# Altium PCB 400390.PcbDoc (part 1 of 5)
Units mm, origin at the board's own origin, x right, y up, seen from the top; angles counter-clockwise.
Board outline 50.8 x 50.4 mm, 4 copper layers (Top Layer, Mid Layer 1, Mid Layer 2, Bottom Layer), stack 1.507 mm thick; 262 components, 210 nets, 1216 pads, 1075 vias.
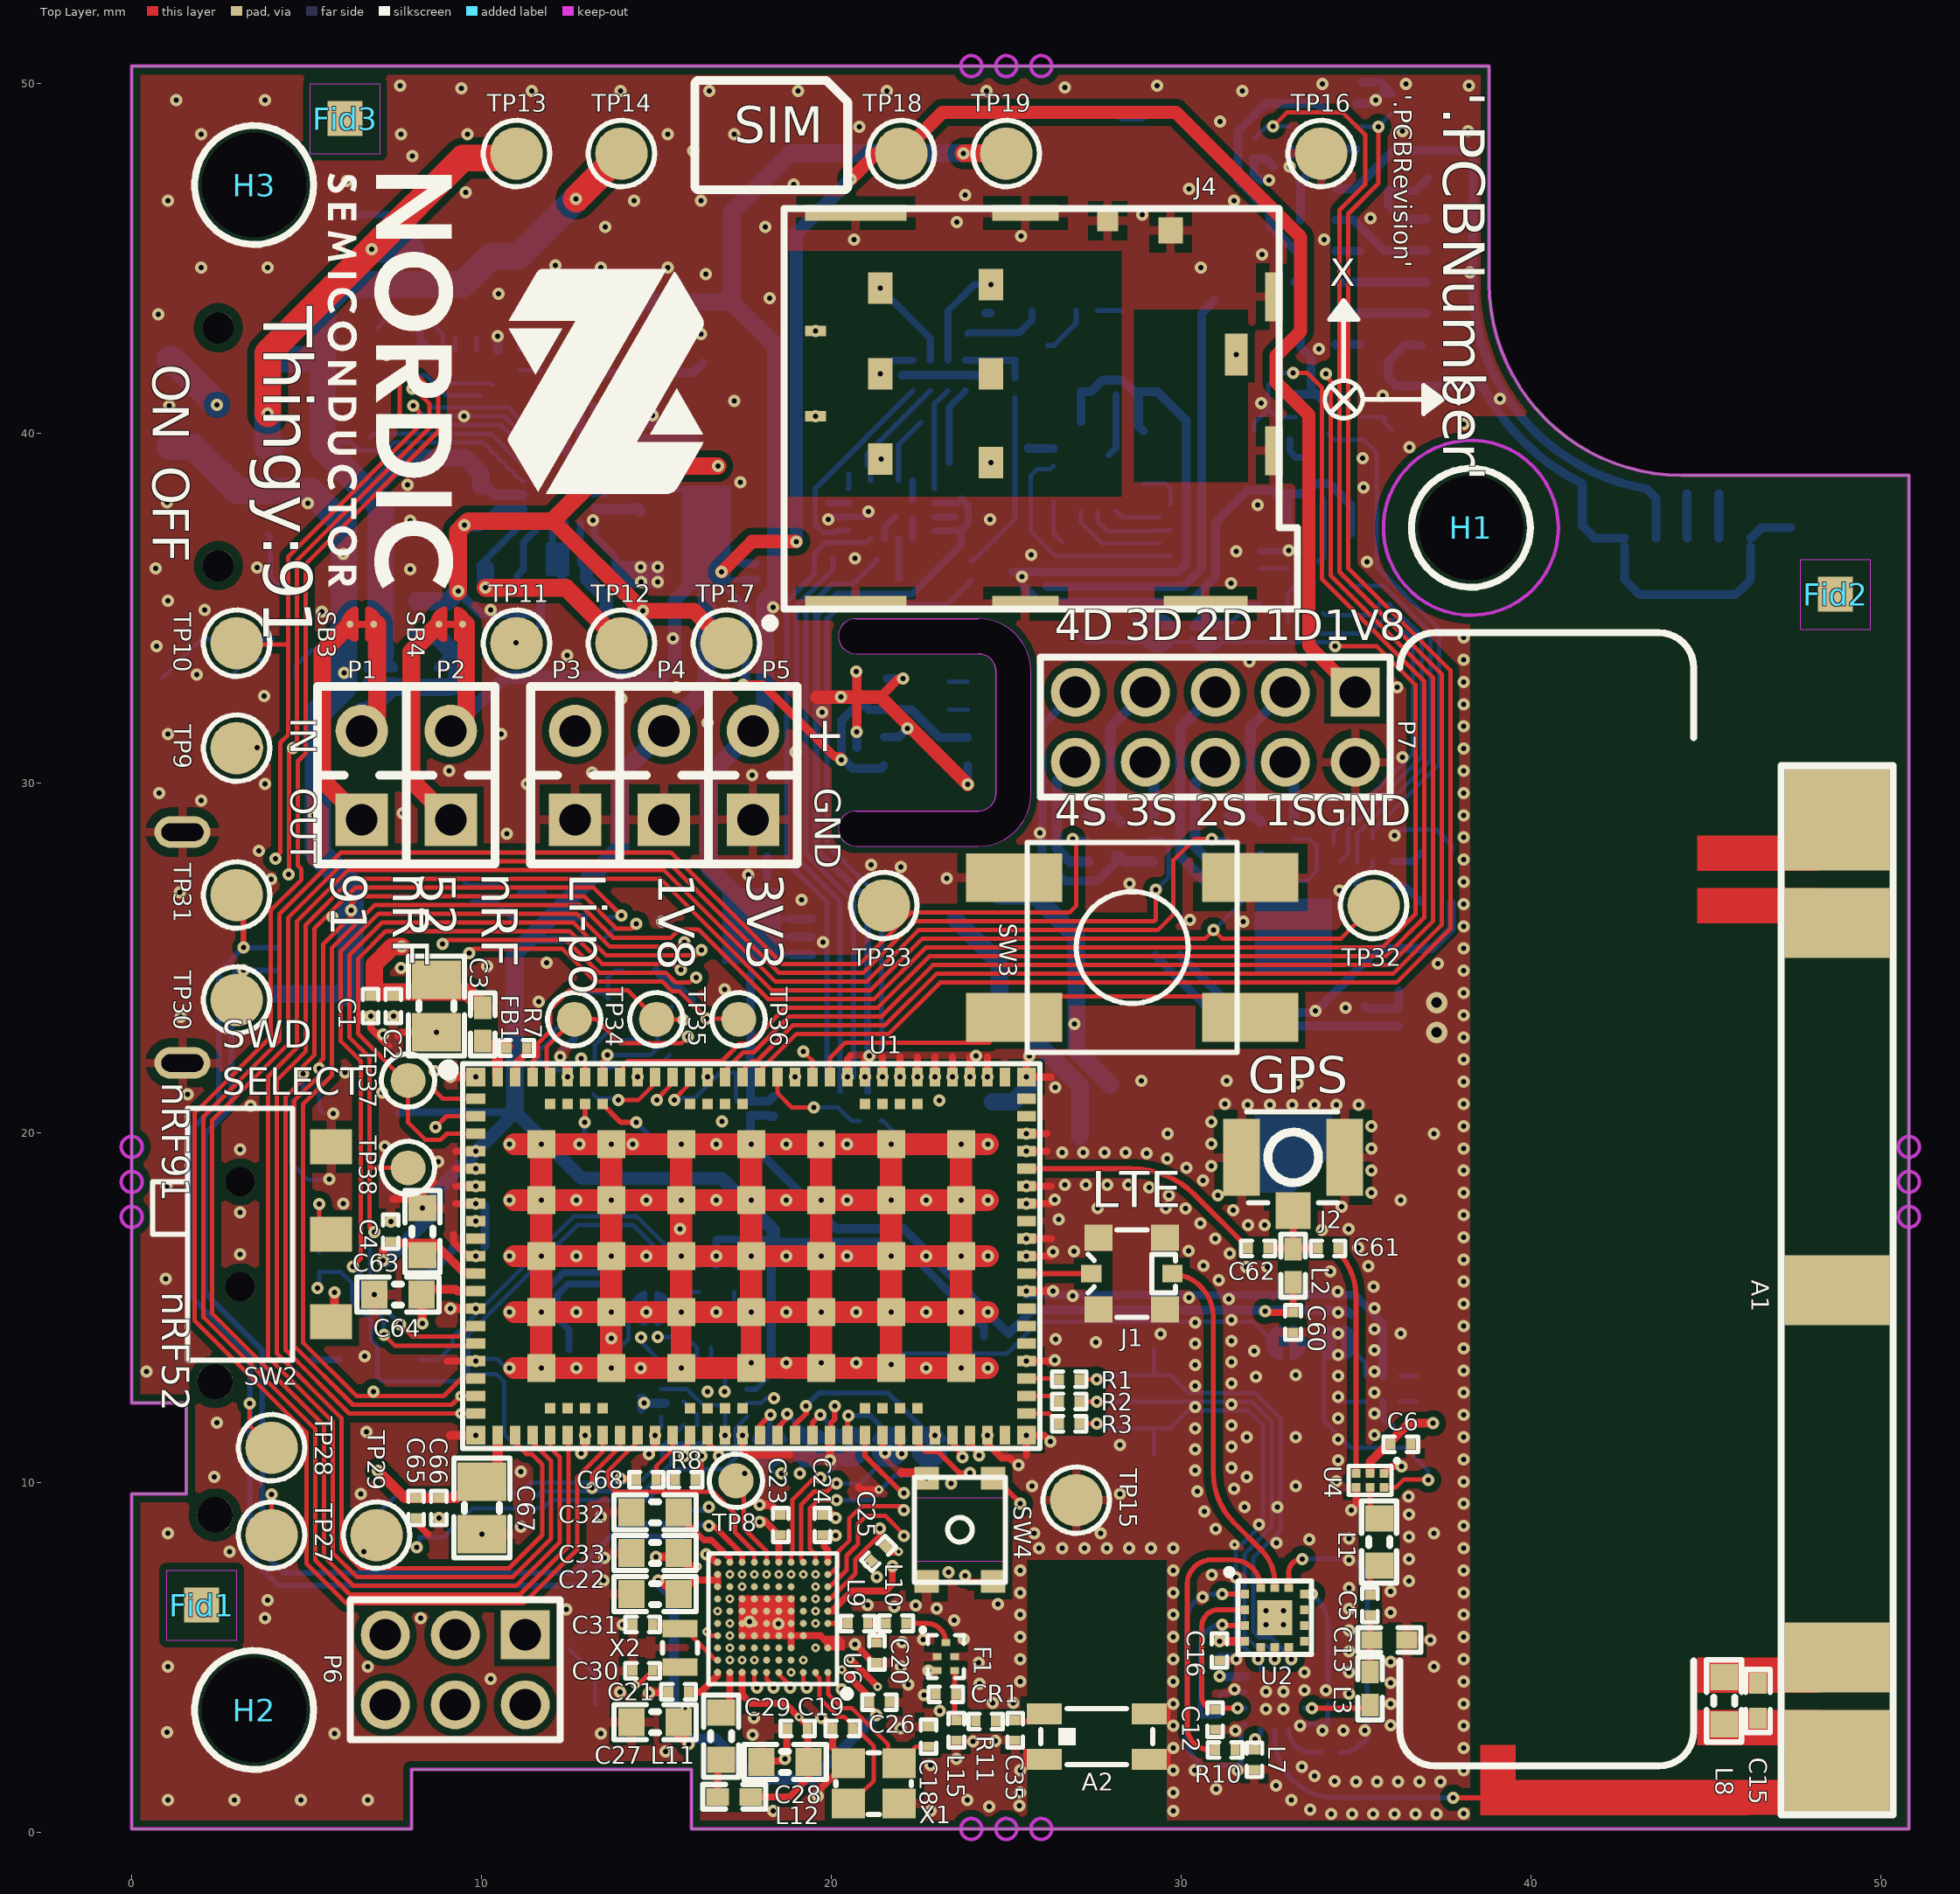
[diagram p0: Top Layer view]
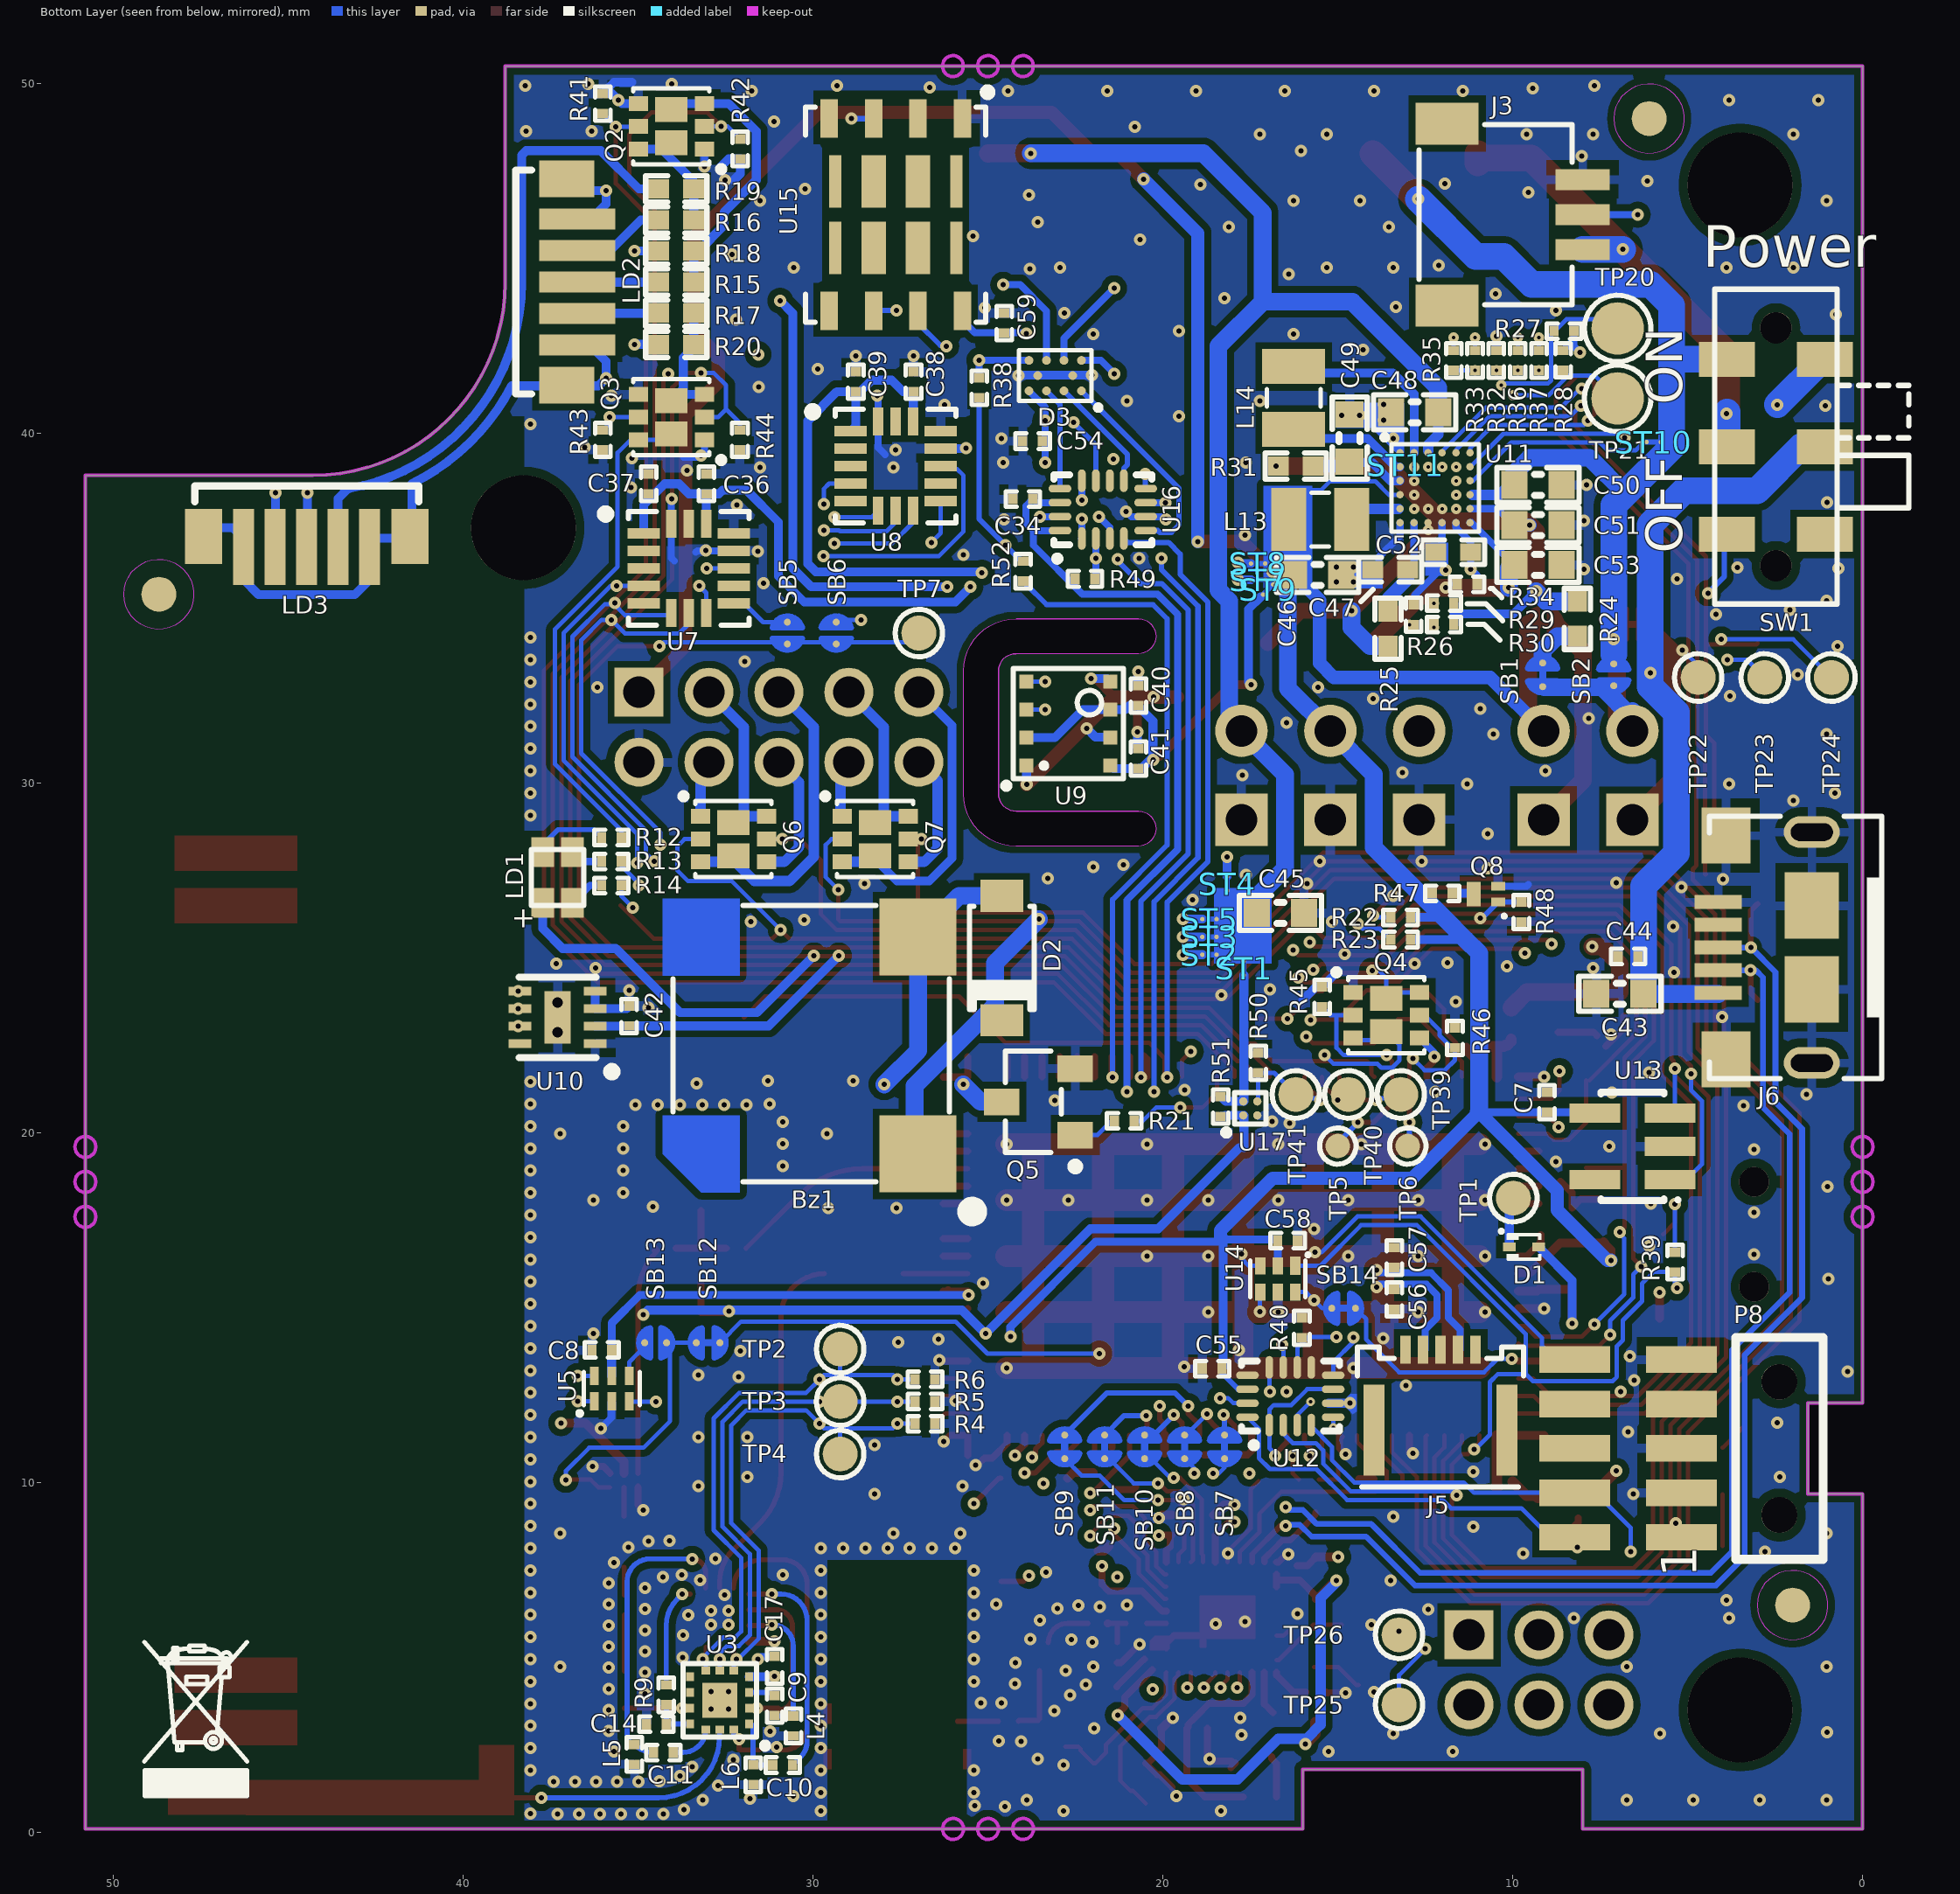
[diagram p1: Bottom Layer view, seen from below]
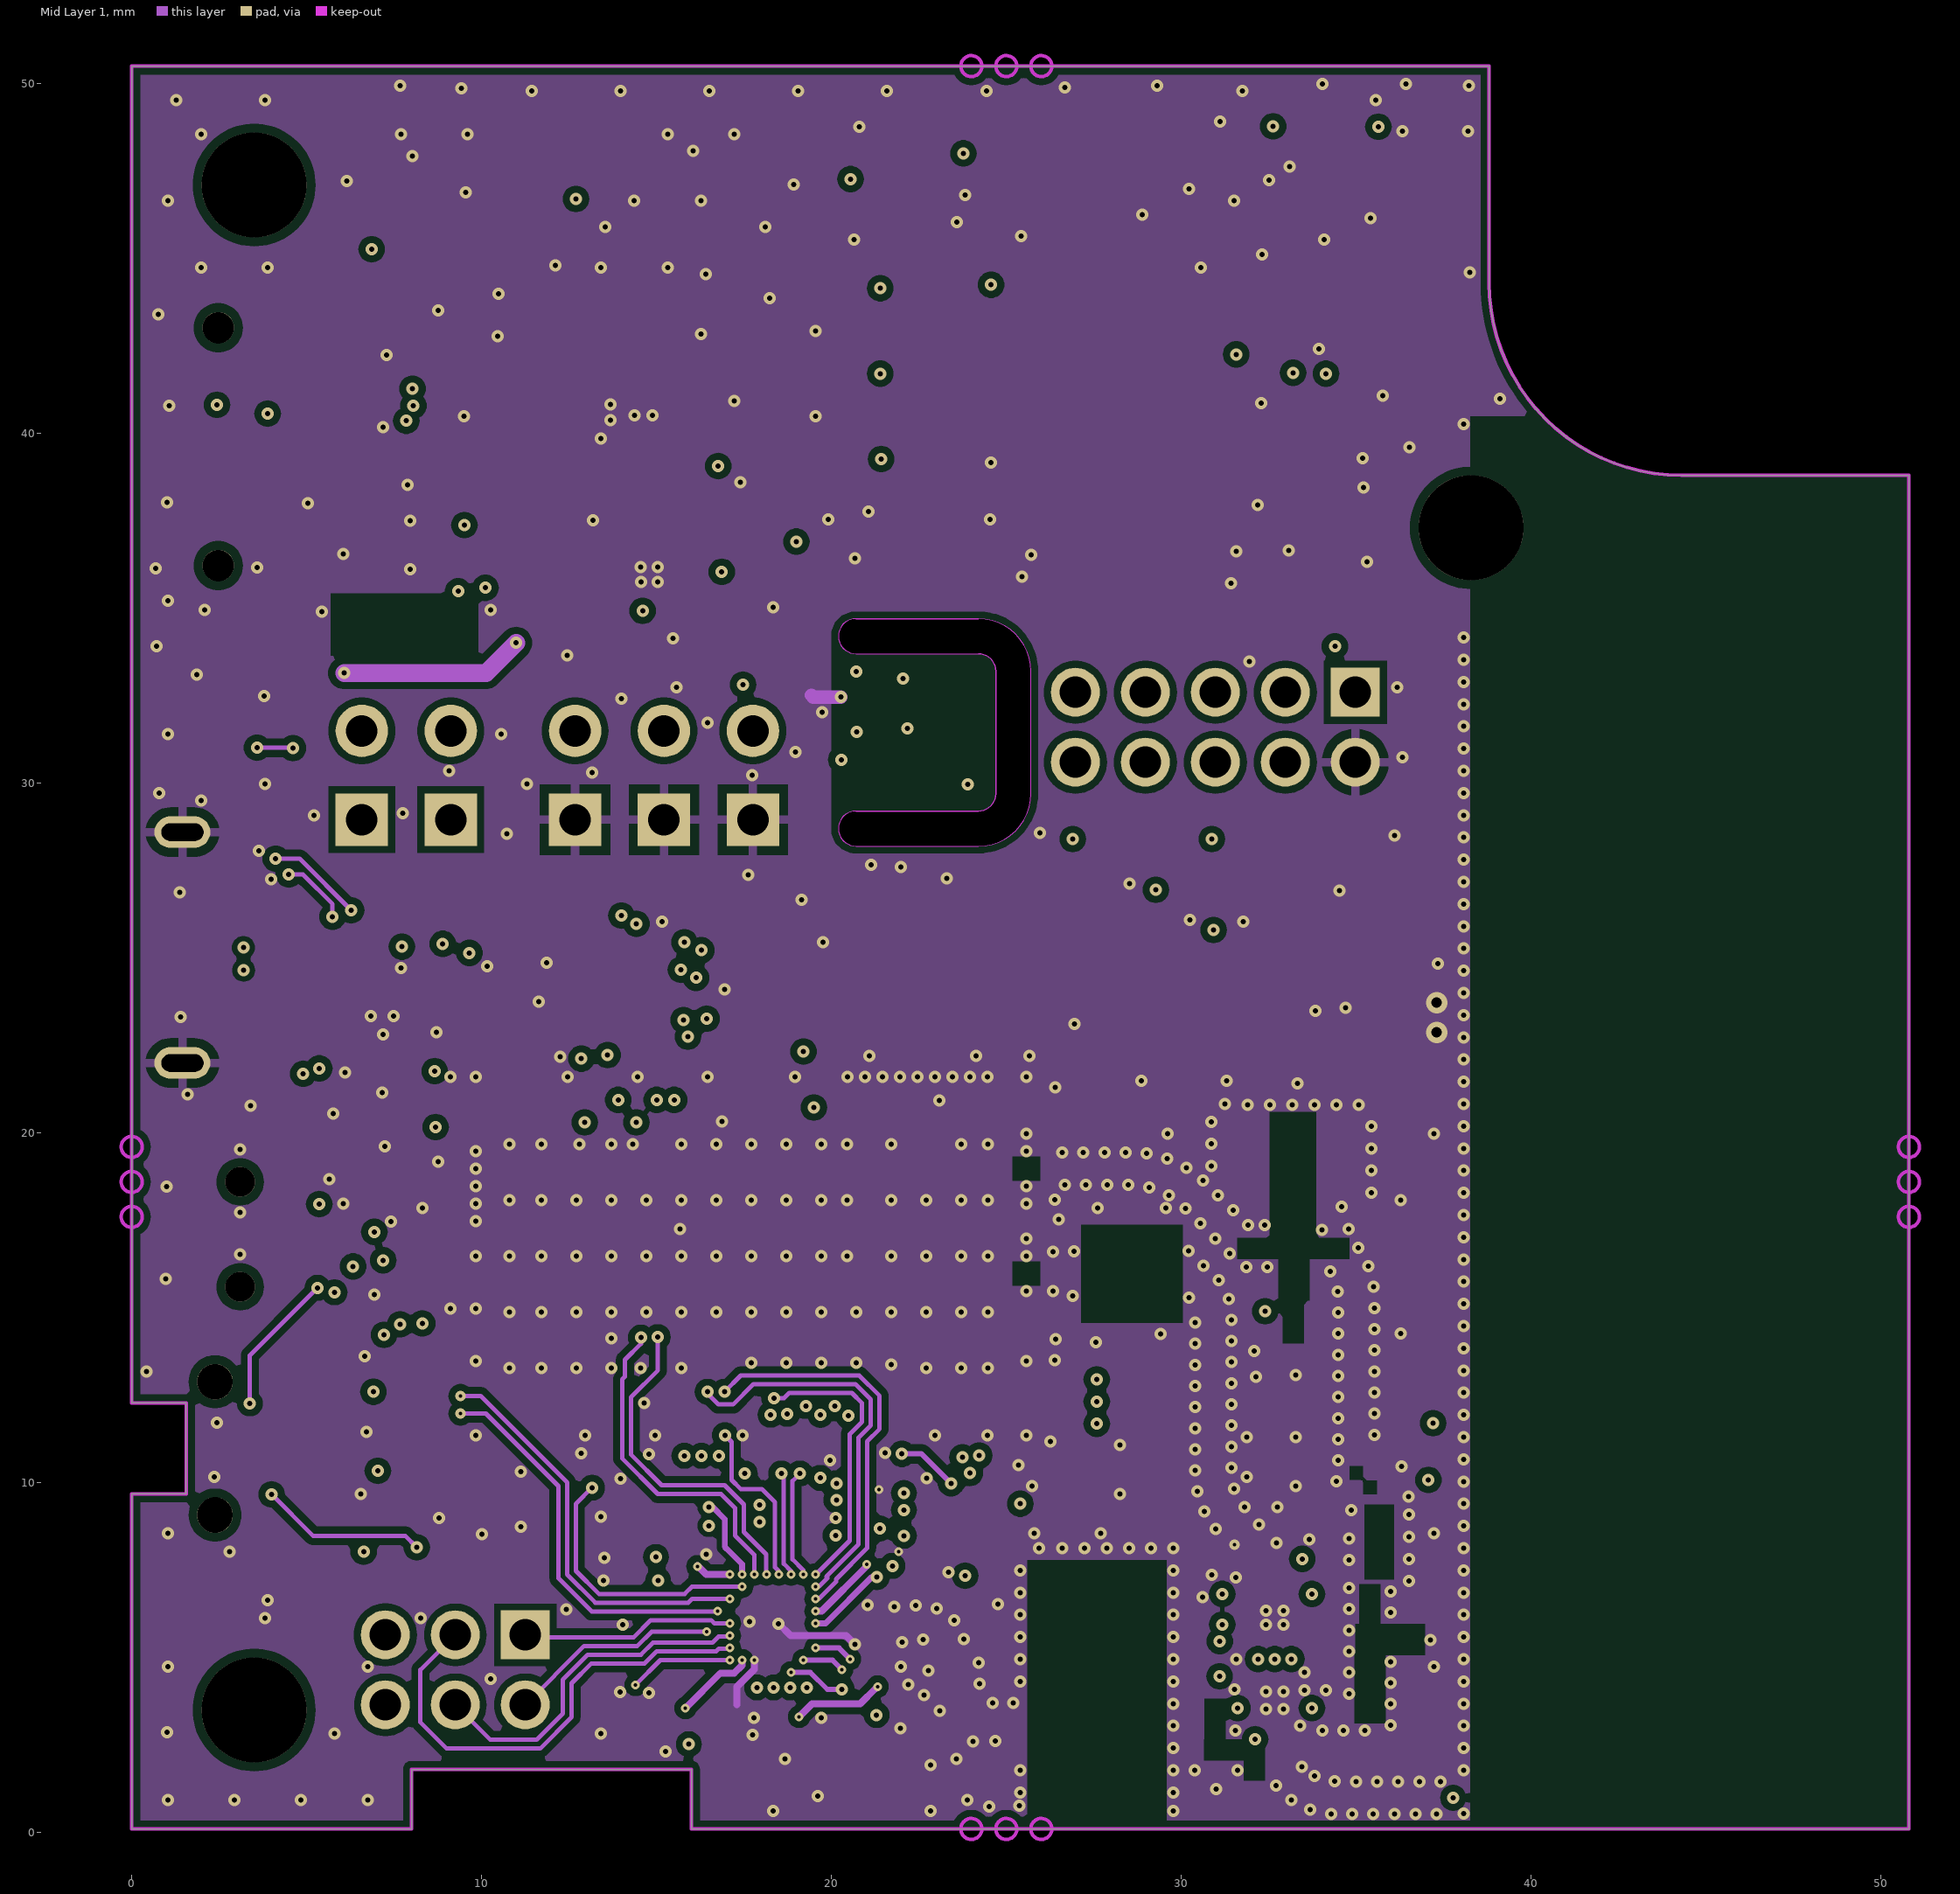
[diagram p2: Mid Layer 1]
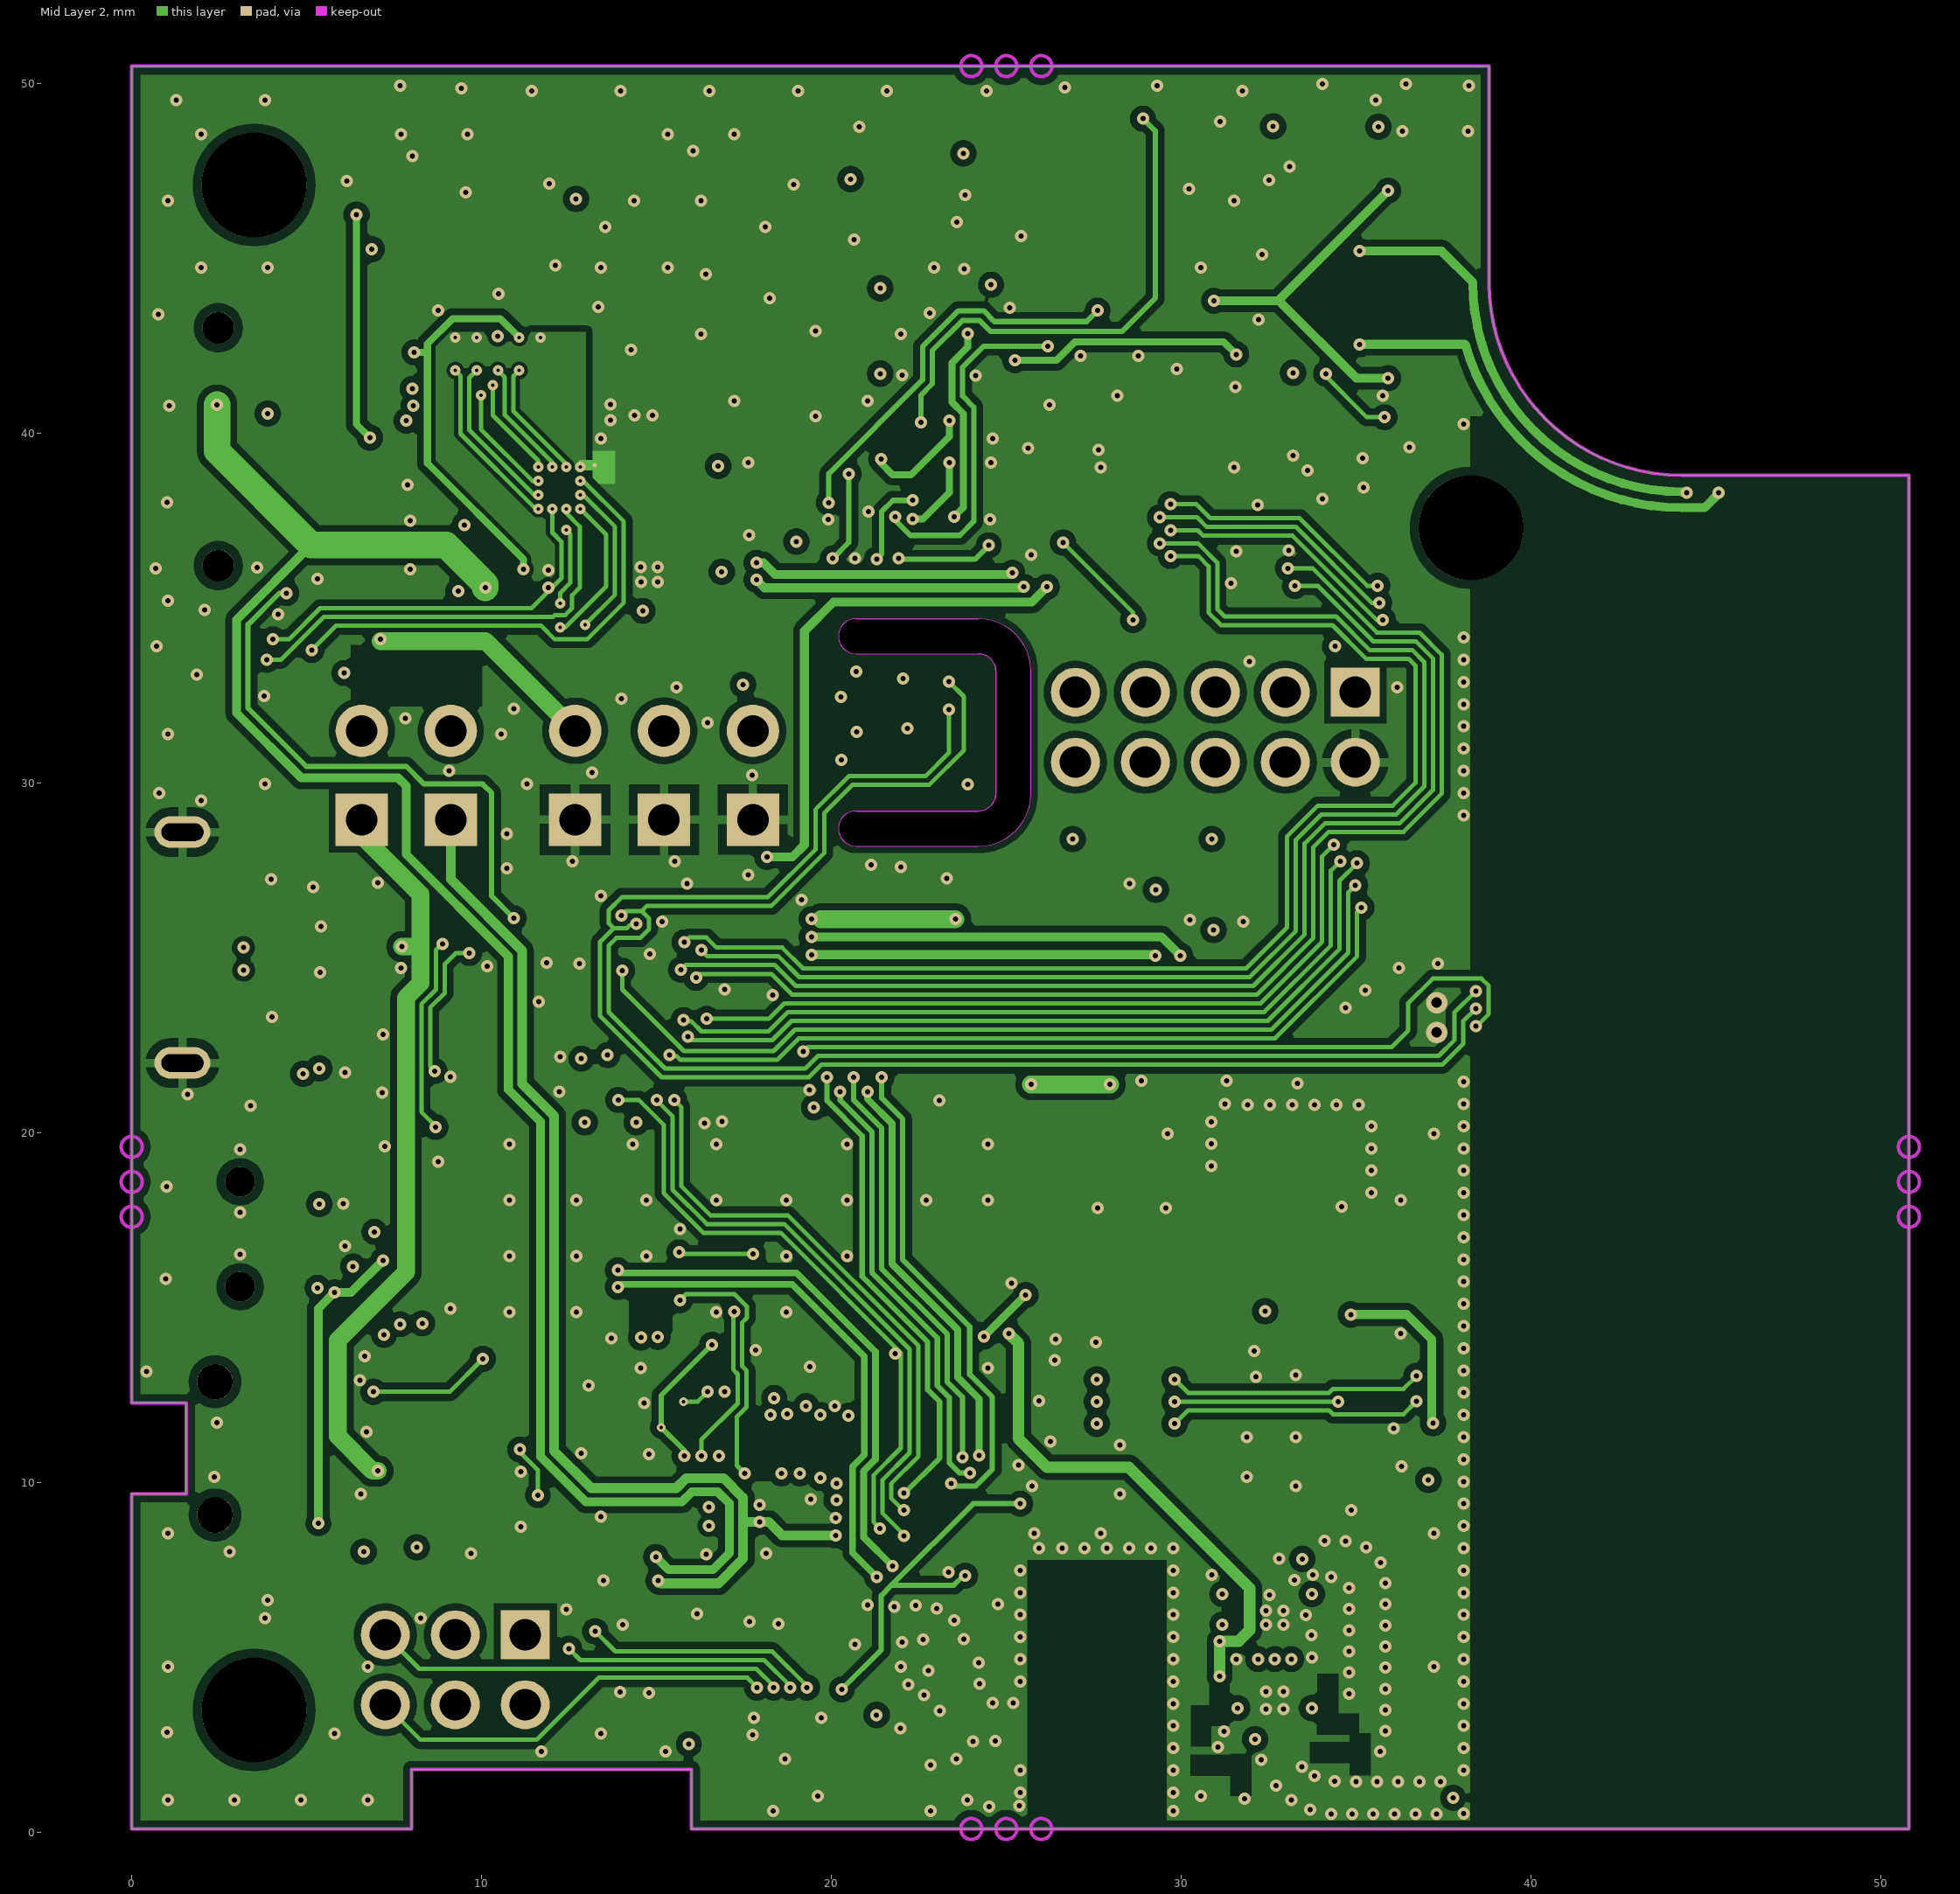
[diagram p3: Mid Layer 2]
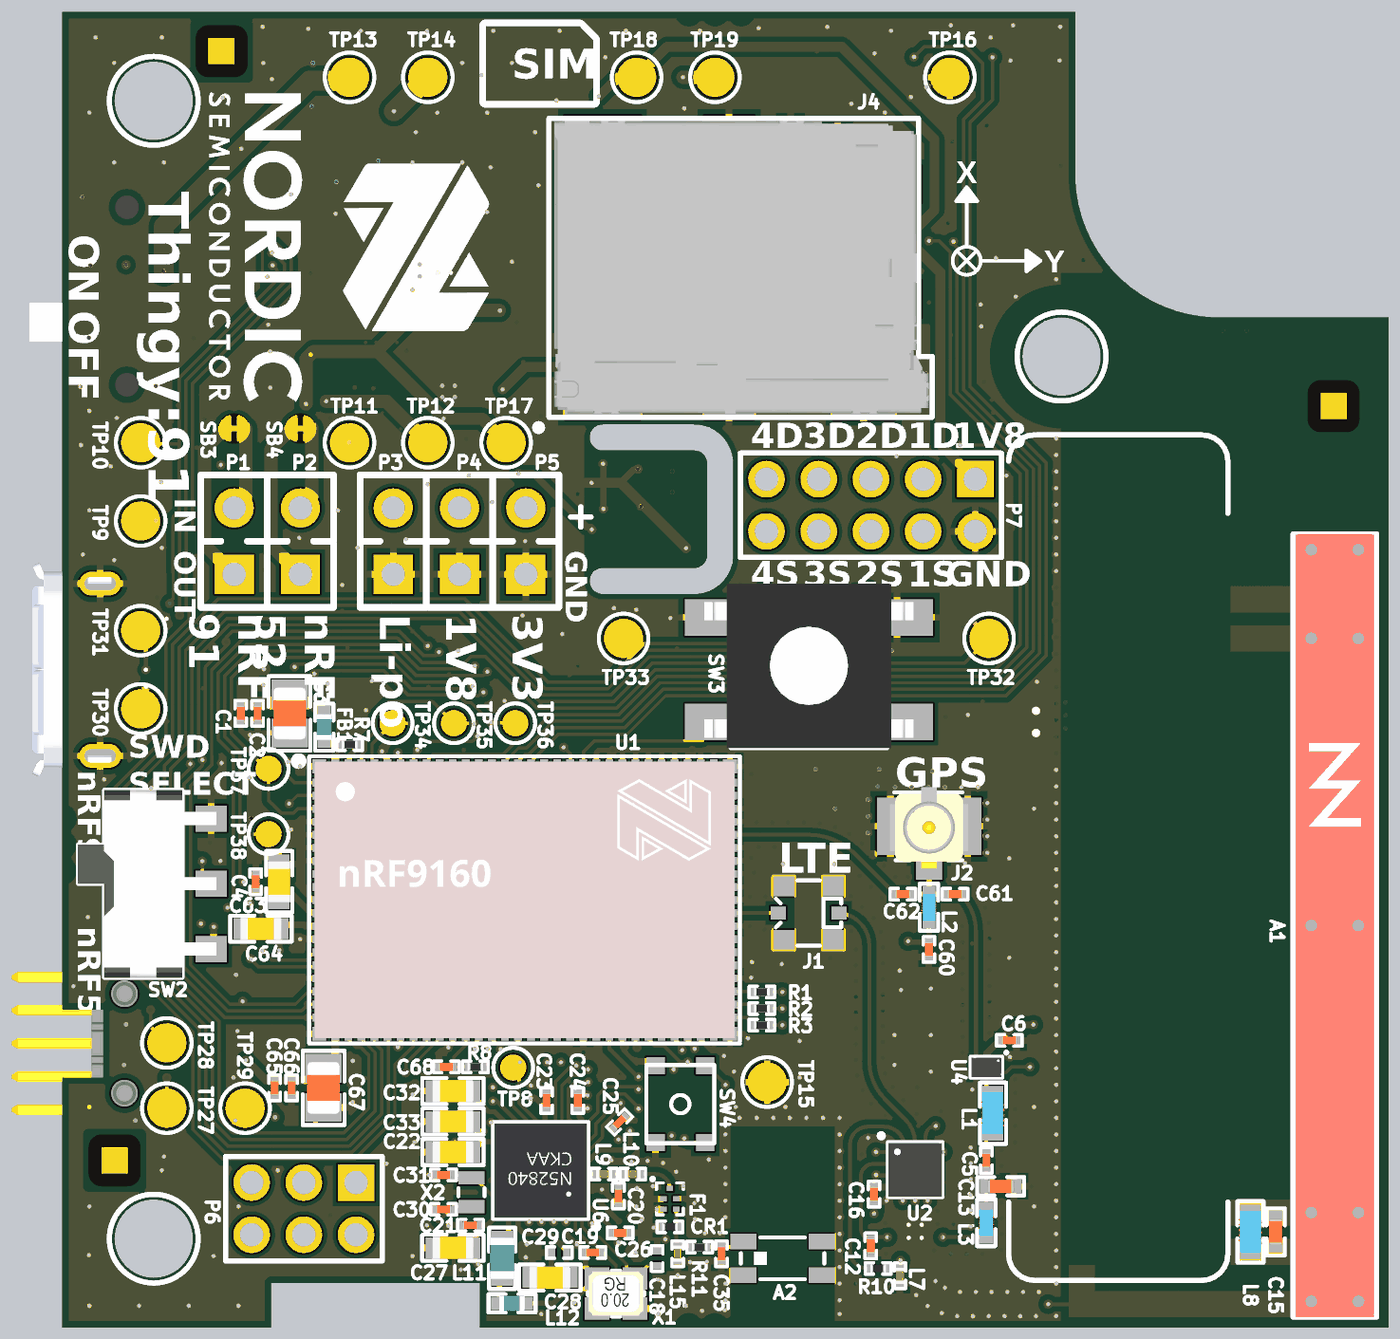
[diagram p7: 3D render of the assembled board from above, using the file's embedded part models]
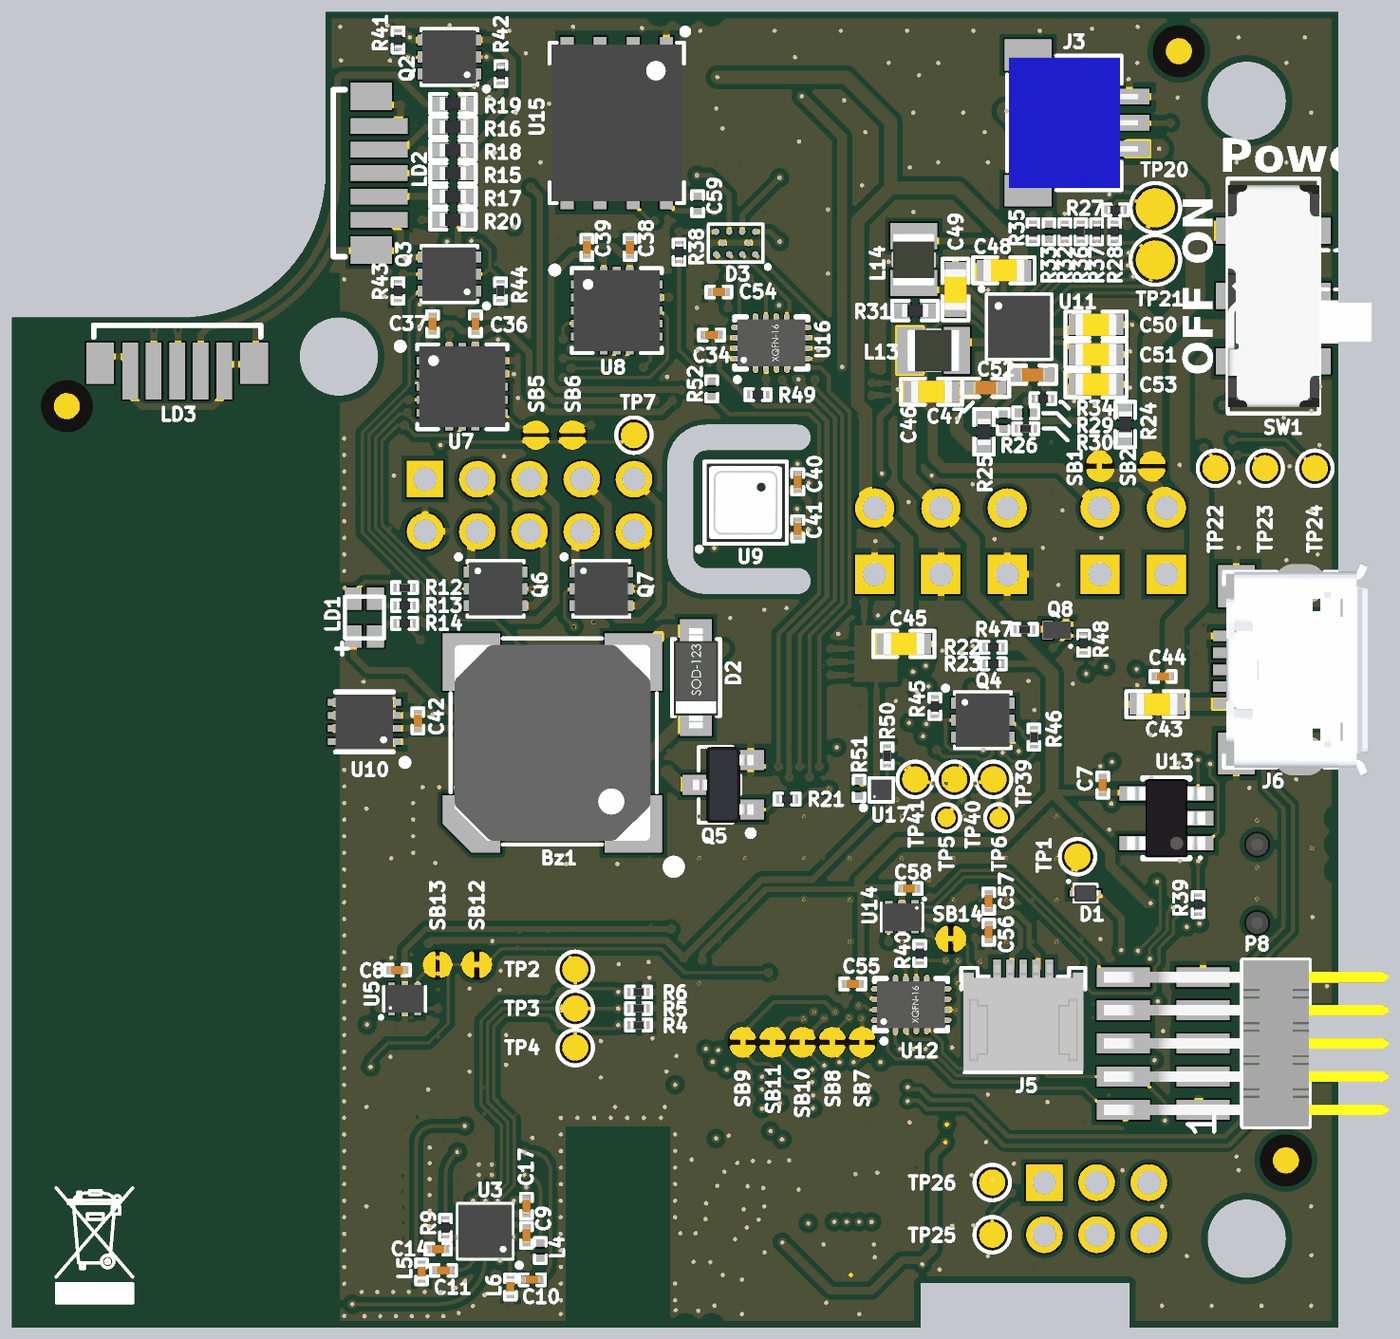
[diagram p8: 3D render of the assembled board from below, using the file's embedded part models]

## Layer stack, top to bottom
Top Solder: solder mask 0.0475, Solder Resist, Dk 3.5
Top Layer: signal copper 0.0175
Dielectric1: core 0.1, FR-4, Dk 4.8
Mid Layer 1: signal copper 0.036
Dielectric 3: prepreg 1.2, Dk 4.2
Mid Layer 2: signal copper 0.036
Dielectric 2: core 0.1, Dk 4.2
Bottom Layer: signal copper 0.0175
Bottom Solder: solder mask 0.0475, Solder Resist, Dk 3.5

## Board outline
0,0.1 0,9.68 1.56,9.68 1.56,12.28 0,12.28 0,50.5 38.8,50.5 38.8,44.3 ccw(c44.3,44.3) 44.3,38.8 50.8,38.8 50.8,0.1 16,0.1 16,1.8 8,1.8 8,0.1
cut-out: 20.7,33.7 24.2,33.7 cw(c24.2,33.2) 24.7,33.2 24.7,29.7 cw(c24.2,29.7) 24.2,29.2 20.7,29.2 ccw(c20.7,28.7) 20.2,28.7 ccw(c20.7,28.7) 20.7,28.2 24.2,28.2 ccw(c24.2,29.7) 25.7,29.7 25.7,33.2 ccw(c24.2,33.2) 24.2,34.7 20.7,34.7 ccw(c20.7,34.2) 20.2,34.2 ccw(c20.7,34.2) 20.7,33.7

## Design rules (kind name [scope] priority, off if disabled: settings)
Clearance USB_Poly_Clearance [(InNamedPolygon('Mid_Layer_1-GND')) vs (OnLayer('Mechanical 3'))] p1: gap=0.254 ignorepadtopadclearanceinfootprint=FALSE except(0: Arc-Hole Track-Hole SMDPad-Hole THPad-Hole Via-Hole Fill-Hole Poly-Hole Region-Hole Text-Hole)
Clearance "NPTH clearance" [Not PadIsPlated And HoleSize > 0] p2: gap=0.25 ignorepadtopadclearanceinfootprint=FALSE except(0: Arc-Hole Track-Hole SMDPad-Hole THPad-Hole Via-Hole Fill-Hole Poly-Hole Region-Hole Text-Hole)
Clearance "Keepout clearance" [All vs OnLayer('Keep-Out Layer')] p3: gap=0.2 ignorepadtopadclearanceinfootprint=FALSE
Clearance USB_Clearance [(InDifferentialPairClass('All Differential Pairs'))] p4: gap=0.15 ignorepadtopadclearanceinfootprint=FALSE except(0.1: Via-Via; 0.125: Arc-Via Track-Via SMDPad-Via)
Clearance ANT_Clerance [InNet('LTE_RF') or InNet('T1F') or InNet('T2F') or InNet('T3F') or InNet('T4F') or InNet('T5F') or InNet('T6F') or InNet('T1A') or InNet('T2A') or InNet('T3A') or InNet('T4A') or InNet('T5A') or InNet('T6A') or InNet('T7A') or InNet('ANT_GPS') or InNet('GPS_RF') or InNet('ANT_LTE')  or InNet('LTE_RF') or InNet('RF') or InNet('BLE_RF') or InNet('nRF52_ANT') or InNet('BLE_ANT') or InNet('GPS_LNA') or InNet('GPS_LNA_IN') vs (InNamedPolygon('Top_Layer-GND')) or (InNamedPolygon('Bottom_Layer-GND'))] p5: gap=0.206 ignorepadtopadclearanceinfootprint=FALSE
Clearance Polygon_Clearance [(InNamedPolygon('Top_Layer-GND')) or (InNamedPolygon('Bottom_Layer-GND')) or (InNamedPolygon('Mid_Layer_1-GND')) or (InNamedPolygon('Mid_Layer_2-GND'))] p6: gap=0.2 ignorepadtopadclearanceinfootprint=FALSE
Clearance SB_Clearance [HasFootprint('Solderbridge') or HasFootprint('QFN40P180X140X55-10N')] p7: gap=0.127 ignorepadtopadclearanceinfootprint=FALSE except(0: Arc-Hole Track-Hole SMDPad-Hole THPad-Hole Via-Hole Fill-Hole Poly-Hole Region-Hole Text-Hole)
Clearance CSP_Clearance [HasFootprint('BGA4C40P2X2_76X76X62')] p8: gap=0.127 ignorepadtopadclearanceinfootprint=FALSE except(0: Arc-Hole Track-Hole SMDPad-Hole THPad-Hole Via-Hole Fill-Hole Poly-Hole Region-Hole Text-Hole)
Clearance P23_Clearance [HasFootprint('FPC_05P-0.5mm-RA-SMD')] p9: gap=0.127 ignorepadtopadclearanceinfootprint=FALSE except(0: Arc-Hole Track-Hole SMDPad-Hole THPad-Hole Via-Hole Fill-Hole Poly-Hole Region-Hole Text-Hole)
Clearance 0.15mm_Clearance [HasFootprint('SOTFL50P162X60-6N') or HasFootprint('LGA50P200X200X80-10N') or HasFootprint('UFQFN40P200X200X65_HS-15N')] p10: gap=0.15 ignorepadtopadclearanceinfootprint=FALSE except(0: Arc-Hole Track-Hole SMDPad-Hole THPad-Hole Via-Hole Fill-Hole Poly-Hole Region-Hole Text-Hole)
Clearance µVia_Clearance [AsMM(HoleSize) = 0.1] p11: gap=0.1 ignorepadtopadclearanceinfootprint=FALSE
Clearance [All] p12: gap=0.125 ignorepadtopadclearanceinfootprint=FALSE
ComponentClearance [All] p1 off: gap=0.254 collisioncheckmode=3 verticalgap=0.254 showdistances=FALSE
DiffPairsRouting [All] p1: maxlimit=0.254 minlimit=0.004 mostfreqgap=0.193 toplayer_minwidth=0.15 toplayer_maxwidth=0.165 toplayer_prefwidth=0.165 midlayer1_minwidth=0.15 midlayer1_maxwidth=0.165 midlayer1_prefwidth=0.165 midlayer2_mingap=0.191 midlayer2_minwidth=0.165 midlayer2_maxwidth=0.165 midlayer2_prefwidth=0.165 bottomlayer_mingap=0.191 bottomlayer_minwidth=0.165 bottomlayer_maxwidth=0.165 bottomlayer_prefwidth=0.165 maxuncoupledlength=12.7
FabricationTestPointUsage TestPointUsage [All] p1: valid=0 allowmultiple=FALSE
FabricationTestpoint Testpoint [All] p1: side=3 testpointundercomponent=TRUE minsize=1.016 maxsize=2.54 preferedsize=1.524 minholesize=0 maxholesize=1.016 preferedholesize=0.813 testpointgrid=0.025 allowsidetop=TRUE allowsidebottom=TRUE usegrid=TRUE gridtolerance=0
Height [All] p1 off: minheight=0 maxheight=25.4 prefheight=12.7
HoleSize [All] p1: absolutevalues=TRUE maxlimit=5 minlimit=0.1 maxpercent=80.000 minpercent=20.000
MinimumAnnularRing [All] p1 off: minimumring=0.152
NetAntennae NetAntennae_ANT [InNet('ANT')] p1: netantennaetolerance=40
NetAntennae [All] p2: netantennaetolerance=0
PolygonConnect PolygonConnect_1 [isVia and (innet('GND') or InNet('AGND')) or HasFootprint('2450AT18D0100_STD-R') or HasFootprint('COAXIAL-SWF') or HasFootprint('2 PIN STARPOINT')] p1: connectstyle=Direct reliefconductorwidth=0.254 reliefentries=4 polygonreliefangle="90 Angle" airgapwidth=0.254
PolygonConnect [All] p2: connectstyle=Relief reliefconductorwidth=0.254 reliefentries=4 polygonreliefangle="90 Angle" airgapwidth=0.254
RoutingVias [All] p1: holewidth=0.15 width=0.35 viastyle="Through Hole" minholewidth=0.1 minwidth=0.25 maxholewidth=0.305 maxwidth=0.61
ShortCircuit ShortCircuit_AGND/GND [InNet('AGND') vs InNet('GND')] p1: allowed=TRUE
ShortCircuit [All] p2: allowed=FALSE
SilkToSolderMaskClearance SilkscreenOverComponentPads [IsPad] p1: minsilkscreentomaskgap=0.254 clearancetoexposedcopper=TRUE
SolderMaskExpansion SolderMaskExpansion_1 [IsVia] p1: expansion=0.102 istentingtop=FALSE
SolderMaskExpansion [All] p2: expansion=0.076 istentingtop=FALSE
UnpouredPolygon [All] p1 off:
Width Width_Diff [(InDifferentialPairClass('All Differential Pairs'))] p1: maxlimit=0.165 minlimit=0.165 preferedwidth=0.165
Width [All] p2: maxlimit=10.16 minlimit=0.125 preferedwidth=0.152 minimp=50.000000 maximp=50.000000 favimp=50.000000
20 further rules are at their usual default settings.

## Classes and differential pairs
differential pair D: +D_P -D_N

## Components (designator, comment, footprint, x,y, rotation, side; value= is the part's Value field where it differs from the comment)
A1 "FR01-S4-210" FR01-S4-210_DF 48.75,15.5 r270 top locked
A2 "2450AT18D0100" 2450AT18D0100_STD-R 27.591,2.743 r180 top locked
Bz1 "Buzzer" Buzzer_SMD_7.5x7.5 30.1,22.5 r0 bottom locked
C1 "15pF" CAPC0603X03L_C#1 6.831,23.629 r270 top
C2 "100nF" CAPC0603X03L_C#1 7.481,23.629 r270 top
C3 "47µF" CAPC2012X11L 8.706,23.627 r270 top
C4 "100nF" CAPC0603X03L_C#1 7.406,17.177 r90 top
C5 "1.0nF" CAPC0603X03L_C#2 35.395,6.5 r90 top
C6 "33nF" CAPC0603X03L_C#2 36.277,11.097 r180 top
C7 "100nF" CAPC0603X03L_C#1 9.017,20.878 r90 bottom
C8 "100nF" CAPC0603X03L_C#2 36.037,13.791 r180 bottom
C9 "2.5pF" CAPC0603X03L_C#2 31.096,3.629 r270 bottom
C10 "5.5pF" CAPC0603X03L_C#2 30.868,1.927 r180 bottom
C11 "9.2pF" CAPC0603X03L_C#2 34.274,2.287 r0 bottom
C12 "1.5pF" CAPC0603X03L_C#2 30.969,3.223 r90 top
C13 "2.5pF" CAPC1005X04L 35.949,5.507 r180 top
C14 "3.1pF" CAPC0603X03L_C#2 34.474,3.096 r180 bottom
C15 "0.5pF" CAPC1005X04L 46.482,3.759 r90 top
C16 "2.2nF" CAPC0603X03L_C#2 31.096,5.204 r90 top
C17 "2.2nF" CAPC0603X03L_C#2 31.096,4.747 r270 bottom
C18 "12pF" CAPC0603X03L_C#2 22.784,2.743 r90 top
C19 "12pF" CAPC0603X03L_C#2 20.32,2.97 r180 top
C20 "1.0pF" CAPC0603X03L_C#2 21.301,5.138 r90 top
C21 "100nF" CAPC0603X03L_C#2 15.63,4.017 r180 top
C22 "4.7µF" CAPC1608X06L 14.963,6.818 r180 top
C23 "100nF" CAPC0603X03L_C#2 18.55,8.793 r90 top
C24 "100nF" CAPC0603X03L_C#2 19.745,8.793 r90 top
C25 "820pF" CAPC0603X03L_C#2 21.346,7.973 r45 top
C26 "100nF" CAPC0603X03L_C#2 21.373,3.723 r0 top
C27 "1.0µF" CAPC1608X06L 14.961,3.15 r180 top
C28 "1.0µF" CAPC1608X06L 18.678,2.011 r0 top
C29 "47nF" CAPC0603X03L_C#2 19.033,2.97 r180 top
C30 "12pF" CAPC0603X03L_C#2 14.605,4.623 r180 top
C31 "12pF" CAPC0603X03L_C#2 14.605,5.944 r180 top
C32 "4.7µF" CAPC1608X06L 14.963,9.155 r180 top
C33 "4.7µF" CAPC1608X06L 14.963,7.987 r180 top
C34 "100nF" CAPC0603X03L_C#1 24.003,38.125 r180 bottom
C35 "0.8pF" CAPC0603X03L_C#2 25.25,2.921 r270 top
C36 "100nF" CAPC0603X03L_C#2 33.045,38.557 r270 bottom
C37 "100nF" CAPC0603X03L_C#2 34.696,38.557 r270 bottom
C38 "100nF" CAPC0603X03L_C#2 27.127,41.478 r270 bottom
C39 "100nF" CAPC0603X03L_C#2 28.778,41.478 r270 bottom
C40 "100nF" CAPC0603X03L_C#2 20.7,32.5 r270 bottom
C41 "100nF" CAPC0603X03L_C#2 20.7,30.7 r270 bottom
C42 "100nF" CAPC0603X03L_C#2 35.255,23.343 r270 bottom
C43 "10µF" CAPC1608X06L 6.934,23.978 r0 bottom
C44 "100nF" CAPC0603X03L_C#2 6.706,25.044 r0 bottom
C45 "4.7µF" CAPC1608X06L 16.637,26.289 r0 bottom
C46 "22µF" CAPC1608X06L 15.576,35.956 r0 bottom
C47 "1.0µF" CAPC1005X04L 13.501,36.106 r180 bottom
C48 "22µF" CAPC1608X06L 12.805,40.605 r180 bottom
C49 "1.0µF" CAPC1608X06L 14.659,39.868 r270 bottom
C50 "4.7µF" CAPC1608X06L 9.274,38.522 r0 bottom
C51 "10µF" CAPC1608X06L 9.274,37.379 r0 bottom
C52 "1.0µF" CAPC1005X04L 11.701,36.601 r180 bottom
C53 "2.2µF" CAPC1608X06L 9.274,36.236 r0 bottom
C54 "10nF" CAPC0603X03L_C#2 23.724,39.776 r0 bottom
C55 "100nF" CAPC0603X03L_C#2 18.593,13.259 r0 bottom
C56 "560pF" CAPC0603X03L_C#2 13.386,15.24 r270 bottom
C57 "560pF" CAPC0603X03L_C#2 13.386,16.434 r270 bottom
C58 "100nF" CAPC0603X03L_C#1 16.434,16.916 r180 bottom
C59 "N.C." CAPC0603X03L_C_NC 24.536,43.155 r270 bottom
C60 "39pF" CAPC0603X03L_C#1 33.198,14.583 r90 top
C61 "39pF" CAPC0603X03L_C#1 34.2,16.7 r0 top
C62 "39pF" CAPC0603X03L_C#1 32.198,16.7 r0 top
C63 "4.7µF" CAPC1608X06L 8.306,17.177 r90 top
C64 "4.7µF" CAPC1608X06L 7.606,15.377 r180 top
C65 "15pF" CAPC0603X03L_C#1 8.131,9.277 r270 top
C66 "100nF" CAPC0603X03L_C#1 8.781,9.277 r270 top
C67 "47µF" CAPC2012X11L 10.006,9.277 r270 top
C68 "100nF" CAPC0603X03L_C#1 14.707,10.084 r180 top
CR1 "EZA-EG1N50AC" RESC0603X03L_C 23.275,3.95 r0 top
D1 "NSR0620P2T5G" SODFL100X40-2N 9.677,16.739 r180 bottom
D2 "1N4148W" SOD-123-DIODE 24.6,25 r90 bottom
D3 "CM1402" CM1402 23.078,41.651 r0 bottom
F1 "SAFFB2G45MA0F0A" SAFFB2G45MA0F0A 23.275,5.025 r270 top
FB1 "120R/0.7A" INDC1005X04L 10.031,23.102 r270 top
Fid1 "Fiducial mark" Fiducial_Round-Square 2,6.5 r0 top value=N.A.
Fid2 "Fiducial mark" Fiducial_Round-Square 48.7,35.4 r0 top value=N.A.
Fid3 "Fiducial mark" Fiducial_Round-Square 6.1,49 r90 top value=N.A.
H1 "3mm,N.P" HOLE_NP_3MM 38.28,37.3 r180 top locked
H2 "3mm,N.P" HOLE_NP_3MM 3.5,3.5 r0 top
H3 "3mm,N.P" HOLE_NP_3MM 3.5,47.1 r270 top
J1 "MM8130-2600" COAXIAL-SWF 28.589,15.977 r90 top
J2 "MHF I Receptacle" "COAXIAL RF U.FL-R-SMT-1" 33.2,19.3 r0 top
J3 "HDR-3, 1mm" SM03B-SRSS-TB 8,46.258 r270 bottom locked
J4 "SF72S006VBAR2500" SF72S006VBAR2500 18.794,35.128 r270 top locked
J5 "FPC 0.5mm RA SMD" FPC_05P-0.5mm-RA-SMD 13.06,13.8 r180 bottom locked
J6 "MicroUSB-B" USB-Micro-B-RA-SMD-PiP 4.125,25.3 r0 bottom locked
L1 "8.2nH" INDC1608X06L_WW 35.654,8.304 r270 top
L2 "68nH" INDC1005X04L_WW 33.2,16.2 r90 top
L3 "2.2nH" INDC1005X04L_WW 35.395,4.112 r270 top
L4 "N.C." INDC0603X03L_C_NC 30.563,3.045 r90 bottom
L5 "6.2nH" INDC0603X03L_C 35.113,2.232 r90 bottom
L6 "5.1nH" INDC0603X03L_C 31.706,1.648 r90 bottom
L7 "4.7nH" INDC0603X03L_C 32.087,2.08 r90 top
L8 "15nH" INDC1608X06L_WW 45.517,3.759 r90 top
L9 "3.9nH" INDC0603X03L_C 20.755,5.976 r0 top
L10 "4.7nH" INDC0603X03L_C 21.847,5.976 r0 top
L11 "10µH" INDC1608X06L 16.849,2.747 r90 top
L12 "15nH" INDC1005X04L 17.224,1.02 r180 top
L13 "2.2µH" INDC2016X18N 15.404,37.535 r0 bottom
L14 "2.2µH" INDC2016X18N 16.259,40.914 r90 bottom
L15 "2.7nH" INDC0603X03L_C 23.574,2.921 r270 top
LD1 "LED RGB" LED_RGB_0606 37.3,27.3 r180 bottom locked
LD2 "LED RGB" MSL0104 36.742,44.328 r90 bottom locked
LD3 "LED RGB" MSL0104 44.475,36.75 r180 bottom locked
P1 "Pin List 1x2" LIST_1x2-NC 6.579,30.226 r90 top locked
P2 "Pin List 1x2" LIST_1x2-NC 9.119,30.226 r90 top locked
P3 "Pin List 1x2" LIST_1x2-NC 12.675,30.226 r90 top locked
P4 "Pin List 1x2" LIST_1x2-NC 15.215,30.226 r90 top locked
P5 "Pin List 1x2" LIST_1x2-NC 17.755,30.226 r90 top locked
P6 "Pin Header 2x3, 2.00mm" HDR_2x3_TH_2.00MM-NC 9.25,4.65 r180 top
P7 "Pin Header 2x5, 2.00mm" HDR_2x5_TH_2.00MM-NC 30.975,31.6 r180 top locked
P8 "Pin Header 2x5" HDR_2x5-SMD-1.27mm-ANG 6.7,10.98 r90 bottom locked
Q2 "TSM250N02DCQ RFG" DFN65P200X200X80_HS-6N 34.051,48.781 r0 bottom
Q3 "TSM250N02DCQ RFG" DFN65P200X200X80_HS-6N 34.051,40.462 r0 bottom
Q4 "TSM250N02DCQ RFG" DFN65P200X200X80_HS-6N 13.614,23.368 r180 bottom
Q5 "BC847C" SOT-23a 22.504,19.939 r90 bottom
Q6 "TSM250N02DCQ RFG" DFN65P200X200X80_HS-6N 32.275,28.4 r180 bottom
Q7 "TSM250N02DCQ RFG" DFN65P200X200X80_HS-6N 28.225,28.4 r180 bottom
Q8 "RV2C010UNT2L" DFN65P100X40-3L 10.77,26.822 r0 bottom
R1 "1k" RESC0603X03L_C 26.797,12.954 r0 top
R2 "1k" RESC0603X03L_C 26.797,12.319 r0 top
R3 "1k" RESC0603X03L_C 26.797,11.684 r0 top
R4 "1M0" RESC0603X03L_C 26.797,11.684 r0 bottom
R5 "1M0" RESC0603X03L_C 26.797,12.319 r0 bottom
R6 "1M0" RESC0603X03L_C 26.797,12.954 r0 bottom
R7 "10k" RESC0603X03L_C 11.006,22.427 r0 top
R8 "1k" RESC0603X03L_C 15.824,10.084 r180 top
R9 "0R" RESC0603X03L_C 34.195,3.934 r90 bottom
R10 "0R" RESC0603X03L_C 31.254,2.359 r180 top
R11 "0R" RESC0603X03L_C 24.412,3.175 r0 top
R12 "100R" RESC0603X03L_C 35.763,28.445 r0 bottom
R13 "39R" RESC0603X03L_C 35.763,27.759 r0 bottom
R14 "39R" RESC0603X03L_C 35.763,27.073 r0 bottom
R15 "169R" RESC1005X04L 33.909,44.323 r0 bottom
R16 "7R15" RESC1005X04L 33.909,46.101 r0 bottom
R17 "11R" RESC1005X04L 33.909,43.434 r0 bottom
R18 "169R" RESC1005X04L 33.909,45.212 r0 bottom
R19 "7R15" RESC1005X04L 33.909,46.99 r0 bottom
R20 "11R" RESC1005X04L 33.909,42.545 r0 bottom
R21 "1k" RESC0603X03L_C 21.107,20.345 r180 bottom
R22 "4k7" RESC0603X03L_C 13.208,26.162 r0 bottom
R23 "4k7" RESC0603X03L_C 13.208,25.527 r0 bottom
R24 "0.1R" RESC1005X04L 8.153,34.696 r90 bottom
R25 "2R2" RESC1005X04L 13.564,34.417 r270 bottom
R26 "N.C." RESC0603X03L_C_NC 12.83,34.814 r90 bottom
R27 "10k" RESC0603X03L_C 8.534,42.926 r0 bottom
R28 "10k" RESC0603X03L_C 8.56,42.088 r270 bottom
R29 "N.C." RESC0603X03L_C_NC 11.967,35.144 r0 bottom
R30 "1M0" RESC0603X03L_C 11.967,34.534 r0 bottom
R31 "2R2" RESC1005X04L 16.205,39.065 r0 bottom
R32 "1M0" RESC0603X03L_C 10.468,42.084 r270 bottom
R33 "N.C." RESC0603X03L_C_NC 11.078,42.084 r90 bottom
R34 "10k" RESC0603X03L_C 11.303,35.687 r0 bottom
R35 "10k" RESC0603X03L_C 11.687,42.084 r270 bottom
R36 "10k" RESC0603X03L_C 9.858,42.084 r90 bottom
R37 "10k" RESC0603X03L_C 9.249,42.084 r90 bottom
R38 "0R" RESC0603X03L_C 25.248,41.304 r270 bottom
R39 "100k" RESC0603X03L_C 5.359,16.307 r270 bottom
R40 "100k" RESC0603X03L_C 16.027,14.427 r90 bottom
R41 "1M0" RESC0603X03L_C 36.012,49.431 r270 bottom
R42 "1M0" RESC0603X03L_C 32.08,48.133 r90 bottom
R43 "1M0" RESC0603X03L_C 36.012,39.812 r90 bottom
R44 "1M0" RESC0603X03L_C 32.09,39.812 r90 bottom
R45 "1M0" RESC0603X03L_C 15.448,23.891 r270 bottom
R46 "1M0" RESC0603X03L_C 11.653,22.718 r270 bottom
R47 "1k" RESC0603X03L_C 12.014,26.848 r180 bottom
R48 "10M" RESC0603X03L_C 9.754,26.314 r270 bottom
R49 "1M0" RESC0603X03L_C 22.225,35.839 r0 bottom
R50 "100k" RESC0603X03L_C 17.275,22 r270 bottom
R51 "N.C." RESC0603X03L_C_NC 18.35,20.75 r90 bottom
R52 "N.C." RESC0603X03L_C_NC 23.995,36.06 r270 bottom
SB1 "Solderbridge" Solderbridge_Shorted#1 9.144,33.096 r90 bottom net-tie
SB2 "Solderbridge" Solderbridge#1 7.112,33.096 r90 bottom
SB3 "Solderbridge" Solderbridge_Shorted#1 6.579,34.544 r0 top net-tie
SB4 "Solderbridge" Solderbridge_Shorted#1 9.119,34.544 r0 top net-tie
SB5 "Solderbridge" Solderbridge#2 30.734,34.29 r90 bottom
SB6 "Solderbridge" Solderbridge#3 29.337,34.29 r90 bottom
SB7 "Solderbridge" Solderbridge_Shorted#1 18.235,11.023 r90 bottom net-tie
SB8 "Solderbridge" Solderbridge_Shorted#1 19.378,11.023 r90 bottom net-tie
SB9 "Solderbridge" Solderbridge_Shorted#1 22.807,11.023 r90 bottom net-tie
SB10 "Solderbridge" Solderbridge_Shorted#1 20.521,11.023 r90 bottom net-tie
SB11 "Solderbridge" Solderbridge_Shorted#1 21.664,11.023 r90 bottom net-tie
SB12 "Solderbridge" Solderbridge_Shorted#1 33,14 r0 bottom net-tie
SB13 "Solderbridge" Solderbridge#1 34.5,14 r180 bottom
SB14 "Solderbridge" Solderbridge_Shorted#2 14.834,14.986 r0 bottom net-tie
ST1 "N.A." "2 PIN STARPOINT"#1 17.688,24.714 r270 bottom net-tie
ST2 "N.A." "2 PIN STARPOINT"#1 18.669,25.095 r0 bottom net-tie
ST3 "N.A." "2 PIN STARPOINT"#1 18.669,25.603 r0 bottom net-tie
ST4 "N.A." "2 PIN STARPOINT"#1 18.161,27.127 r90 bottom net-tie
ST5 "N.A." "2 PIN STARPOINT"#1 18.669,26.111 r0 bottom net-tie
ST7 "N.A." "2 PIN STARPOINT"#1 17.272,35.814 r0 bottom net-tie
ST8 "N.A." "2 PIN STARPOINT"#1 17.279,36.279 r0 bottom net-tie
ST9 "N.A." "2 PIN STARPOINT"#1 16.993,35.535 r315 bottom net-tie
ST10 "N.A." "2 PIN STARPOINT"#1 5.969,39.751 r180 bottom net-tie
ST11 "N.A." "2 PIN STARPOINT"#2 13.056,39.091 r0 bottom net-tie
SW1 "Switch" Switch-Slide-RA-J-Lead-DPDT-8.5x3.5mm 2.475,39.62 r90 bottom locked
SW2 "AYZ0102AGRLC" AYZ0102AGRLC 3.1,17.1 r270 top locked
SW3 "PB SW" Switch-PB-6.2x6.3mm-SMD 28.6,25.3 r0 top locked
SW4 "PB SW" SW_TACTILE_2.6x3.0MM_4-LEAD 23.673,8.654 r90 top
TP1 "Ø1.0mm,SMD" TP_SMD_Ø1.0mm 9.982,18.136 r180 bottom
TP2 "Ø1.0mm,SMD" TP_SMD_Ø1.0mm 29.225,13.819 r90 bottom
TP3 "Ø1.0mm,SMD" TP_SMD_Ø1.0mm 29.225,12.319 r90 bottom
TP4 "Ø1.0mm,SMD" TP_SMD_Ø1.0mm 29.225,10.819 r0 bottom
TP5 "Ø0.7mm,SMD" TP_SMD_Ø0.7mm 15,19.625 r180 bottom
TP6 "Ø0.7mm,SMD" TP_SMD_Ø0.7mm 13,19.625 r180 bottom
TP7 "Ø1.0mm,SMD" TP_SMD_Ø1.0mm 26.975,34.29 r180 bottom
TP8 "Ø1.0mm,SMD" TP_SMD_Ø1.0mm 17.272,10.054 r0 top
TP9 "Ø1.5mm,SMD" TP_SMD_Ø1.5mm 3,31 r0 top locked
TP10 "Ø1.5mm,SMD" TP_SMD_Ø1.5mm 3,34 r0 top locked
TP11 "Ø1.5mm,SMD" TP_SMD_Ø1.5mm 11,34 r0 top locked
TP12 "Ø1.5mm,SMD" TP_SMD_Ø1.5mm 14,34 r0 top locked
TP13 "Ø1.5mm,SMD" TP_SMD_Ø1.5mm 11,48 r0 top locked
TP14 "Ø1.5mm,SMD" TP_SMD_Ø1.5mm 14,48 r0 top locked
TP15 "Ø1.5mm,SMD" TP_SMD_Ø1.5mm 27,9.5 r0 top locked
TP16 "Ø1.5mm,SMD" TP_SMD_Ø1.5mm 34,48 r0 top locked
TP17 "Ø1.5mm,SMD" TP_SMD_Ø1.5mm 17,34 r0 top
TP18 "Ø1.5mm,SMD" TP_SMD_Ø1.5mm 22,48 r0 top locked
TP19 "Ø1.5mm,SMD" TP_SMD_Ø1.5mm 25,48 r0 top locked
TP20 "Ø1.5mm,SMD" TP_SMD_Ø1.5mm 7,43 r180 bottom
TP21 "Ø1.5mm,SMD" TP_SMD_Ø1.5mm 7,41 r180 bottom
TP22 "Ø1.0mm,SMD" TP_SMD_Ø1.0mm 4.699,33.02 r180 bottom
TP23 "Ø1.0mm,SMD" TP_SMD_Ø1.0mm 2.794,33.02 r180 bottom
TP24 "Ø1.0mm,SMD" TP_SMD_Ø1.0mm 0.889,33.02 r180 bottom
TP25 "Ø1.0mm,SMD" TP_SMD_Ø1.0mm 13.25,3.65 r180 bottom
TP26 "Ø1.0mm,SMD" TP_SMD_Ø1.0mm 13.25,5.65 r180 bottom
TP27 "Ø1.5mm,SMD" TP_SMD_Ø1.5mm 4,8.5 r0 top locked
TP28 "Ø1.5mm,SMD" TP_SMD_Ø1.5mm 4,11 r0 top locked
TP29 "Ø1.5mm,SMD" TP_SMD_Ø1.5mm 7,8.5 r0 top locked
TP30 "Ø1.5mm,SMD" TP_SMD_Ø1.5mm 3,23.8 r0 top locked
TP31 "Ø1.5mm,SMD" TP_SMD_Ø1.5mm 3,26.8 r0 top locked
TP32 "Ø1.5mm,SMD" TP_SMD_Ø1.5mm 35.5,26.5 r0 top
TP33 "Ø1.5mm,SMD" TP_SMD_Ø1.5mm 21.5,26.5 r0 top
TP34 "Ø1.0mm,SMD" TP_SMD_Ø1.0mm 12.65,23.25 r90 top
TP35 "Ø1.0mm,SMD" TP_SMD_Ø1.0mm 15,23.25 r90 top
TP36 "Ø1.0mm,SMD" TP_SMD_Ø1.0mm 17.35,23.25 r90 top
TP37 "Ø1.0mm,SMD" TP_SMD_Ø1.0mm 7.9,21.5 r0 top
TP38 "Ø1.0mm,SMD" TP_SMD_Ø1.0mm 7.9,19 r0 top
TP39 "Ø1.0mm,SMD" TP_SMD_Ø1.0mm 13.2,21.1 r180 bottom
TP40 "Ø1.0mm,SMD" TP_SMD_Ø1.0mm 14.7,21.1 r180 bottom
TP41 "Ø1.0mm,SMD" TP_SMD_Ø1.0mm 16.2,21.1 r180 bottom
U1 "nRF9160-SICAB1A" LGA50P1600X1050X104-161N 17.706,16.477 r0 top locked
U2 "QM12038" UFQFN40P200X200X65_HS-15N#1 32.671,6.144 r0 top locked
U3 "QM12038" UFQFN40P200X200X65_HS-15N#2 32.671,3.781 r0 bottom locked
U4 "BGA524N6" XFDFN40P100X55-6N 35.4,10.07 r270 top
U5 "NC7SV11L6X" DFN1410-6N 35.758,12.688 r90 bottom
U6 "nRF52840_CKAA" BGA94C35P10X10_352X356X50 18.322,6.151 r180 top locked
U7 "ADXL372" LGA50P322X300X114-16N 33.553,36.144 r180 bottom
U8 "ADXL362" LGA50P322X300X114-16N 27.635,39.065 r180 bottom
U9 "BME680" BME680 22.7,31.7 r0 bottom
U10 "BH1749NUC" WSON50P210X210X60_HS-9N 37.3,23.3 r0 bottom locked
U11 "ADP5360ACBZ" BGA32C40P6X6_238X238X56 12.221,38.446 r180 bottom locked
U12 "FSA2466UMX" XQFN40P180X260X50-16N 16.358,12.471 r90 bottom
U13 "24CW160" SOT-23-5 6.579,19.609 r90 bottom
U14 "FSA4157L6X" PSON50P100X60-6N 16.713,15.824 r270 bottom
U15 "MFFx_M2M_UICC" SON127P600X90_HS-8N 27.635,46.253 r270 bottom value="M2M UICC"
U16 "NX3DV2567" XQFN40P180X260X50-16N 21.717,37.821 r90 bottom locked
U17 "TCK106AG" BGA4C40P2X2_76X76X62 17.5,20.7 r90 bottom
X1 "32MHz" BT-XTAL_2016 21.209,1.397 r180 top
X2 "32.768kHz" XTAL_1610 15.672,5.278 r90 top

## Footprints (in the part's own frame and the unit in brackets; to place one, negate y for a bottom-side part, rotate by r counter-clockwise, add the part's x,y. Pads: shape width x height; smd on the part's side, far side on the other; paste and mask are expansions set on the pad)
"2 PIN STARPOINT"#1 [mil]
  round 5 smd paste-3 mask-3: 1(-8,0) 2(8,0)
  Top Layer region: -11,3.01 11,3.01 11,-2.99 -11,-2.99
"2 PIN STARPOINT"#2 [mil]
  round 5 on Mid2 paste+0 mask+0: 1(-7,0) 2(7,0)
  Mid Layer 2 region: -11,6 11,6 11,-6 -11,-6
2450AT18D0100_STD-R [mm] "2450MHz Antenna"
  rect 1x0.6 smd mask+0.051: 1(1.5,-0.65) 2(-1.5,-0.65) 2(-1.5,0.65) 2(1.5,0.65)
  Top Layer pour cut-out: 2,-5.05 2,0.95 -2,0.95 -2,-5.05
  Bottom Layer pour cut-out: 2,-5.05 2,0.95 -2,0.95 -2,-5.05
  silkscreen extent -1.6,-0.8 1.6,0.8, body extent -1.61,-0.8 1.6,0.81, height 1.2
AYZ0102AGRLC [mm] "Slide Switches - SPDT, SMD, ON-ON"
  round 0.85 hole 0.85 unplated: 0(-1.5,0) 0(1.5,0)
  rect 1x1.2 smd: 1(-2.5,2.6) 2(0,2.6) 3(2.5,2.6)
  silkscreen extent -3.6,-2.5 3.6,1.5, body extent -3.6,-2.5 3.6,2.8, height 1.5
BGA4C40P2X2_76X76X62 [mm] "BGA, 4-Leads, Body 0.8x0.8mm,  Pitch 0.40mm"
  round 0.235 smd mask+0.05: A1(-0.2,0.2) A2(0.2,0.2) B1(-0.2,-0.2) B2(0.2,-0.2)
  silkscreen extent -0.74,-0.45 0.45,0.74, body extent -0.39,-0.39 0.4,0.4, height 0.55
BGA32C40P6X6_238X238X56 [mm] "BGA, 32-Leads, Body 2.38x2.38mmx0.56mm, Pitch 0.40mm"
  round 0.21 smd: A1(-1,1) A2(-0.6,1) A3(-0.2,1) A4(0.2,1) A5(0.6,1) A6(1,1) B1(-1,0.6) B2(-0.6,0.6) B3(-0.2,0.6) B4(0.2,0.6) B5(0.6,0.6) B6(1,0.6) C1(-1,0.2) C2(-0.6,0.2) C5(0.6,0.2) C6(1,0.2) D1(-1,-0.2) D2(-0.6,-0.2) D5(0.6,-0.2) D6(1,-0.2) E1(-1,-0.6) E2(-0.6,-0.6) E3(-0.2,-0.6) E4(0.2,-0.6) E5(0.6,-0.6) E6(1,-0.6) F1(-1,-1) F2(-0.6,-1) F3(-0.2,-1) F4(0.2,-1) F5(0.6,-1) F6(1,-1)
  silkscreen extent -1.49,-1.25 1.25,1.49, body extent -1.19,-1.19 1.19,1.19, height 0.56
BGA94C35P10X10_352X356X50 [mm] "BGA, 94-Leads, Body 3.52x3.56mmx0.50mm, Pitch 0.35mm"
  round 0.2 smd mask+0.04: A1(-1.575,1.575) A2(-1.225,1.575) A3(-0.875,1.575) A4(-0.525,1.575) A5(-0.175,1.575) A6(0.175,1.575) A7(0.525,1.575) A8(0.875,1.575) A9(1.225,1.575) A10(1.575,1.575) B3(-0.875,1.225) B4(-0.525,1.225) B5(-0.175,1.225) B6(0.175,1.225) B7(0.525,1.225) B8(0.875,1.225) B9(1.225,1.225) B10(1.575,1.225) C1(-1.575,0.875) C2(-1.225,0.875) C4(-0.525,0.875) C5(-0.175,0.875) C6(0.175,0.875) C7(0.525,0.875) C8(0.875,0.875) C9(1.225,0.875) C10(1.575,0.875) D3(-0.875,0.525) D4(-0.525,0.525) D5(-0.175,0.525) D6(0.175,0.525) D7(0.525,0.525) D8(0.875,0.525) D9(1.225,0.525) D10(1.575,0.525) E1(-1.575,0.175) E2(-1.225,0.175) E3(-0.875,0.175) E4(-0.525,0.175) E5(-0.175,0.175) E6(0.175,0.175) E7(0.525,0.175) E8(0.875,0.175) E9(1.225,0.175) E10(1.575,0.175) F1(-1.575,-0.175) F2(-1.225,-0.175) F3(-0.875,-0.175) F4(-0.525,-0.175) F5(-0.175,-0.175) F6(0.175,-0.175) F7(0.525,-0.175) F8(0.875,-0.175) F9(1.225,-0.175) F10(1.575,-0.175) G1(-1.575,-0.525) G2(-1.225,-0.525) G3(-0.875,-0.525) G4(-0.525,-0.525) G5(-0.175,-0.525) G6(0.175,-0.525) G7(0.525,-0.525) G8(0.875,-0.525) G9(1.225,-0.525) G10(1.575,-0.525) H1(-1.575,-0.875) H2(-1.225,-0.875) H4(-0.525,-0.875) H5(-0.175,-0.875) H6(0.175,-0.875) H7(0.525,-0.875) H8(0.875,-0.875) H9(1.225,-0.875) H10(1.575,-0.875) J1(-1.575,-1.225) J2(-1.225,-1.225) J3(-0.875,-1.225) J4(-0.525,-1.225) J5(-0.175,-1.225) J6(0.175,-1.225) J7(0.525,-1.225) J8(0.875,-1.225) J9(1.225,-1.225) J10(1.575,-1.225) K1(-1.575,-1.575) K2(-1.225,-1.575) K3(-0.875,-1.575) K4(-0.525,-1.575) K5(-0.175,-1.575) K6(0.175,-1.575) K7(0.525,-1.575) K8(0.875,-1.575) K9(1.225,-1.575) K10(1.575,-1.575)
  silkscreen extent -2.22,-1.83 1.83,2.28, body extent -1.77,-1.76 1.77,1.84, height 0.47
BME680 [mm]
  rect 0.4x0.4 smd mask+0.1: 1(1.2,1.2) 2(1.2,0.4) 3(1.2,-0.4) 4(1.2,-1.2) 5(-1.2,-1.2) 6(-1.2,-0.4) 7(-1.2,0.4) 8(-1.2,1.2)
  silkscreen extent -1.58,-1.58 1.83,1.82, body extent -1.5,-1.5 1.5,1.5, height 0.93
BT-XTAL_2016 [mm] "Crystal 2.0 x 1.6 mm"
  rect 0.95x0.85 smd: 1(-0.725,-0.575) 2(0.725,-0.575) 3(0.725,0.575) 4(-0.725,0.575)
  silkscreen extent -1.08,-0.88 1.08,0.88, body extent -1.05,-0.85 1.05,0.85, height 0.56
Buzzer_SMD_7.5x7.5 [mm]
  rect 2.2x2.2 smd: 1(-3.1,3.1) 2(-3.1,-3.1)
  Top Layer region: 2,-4.2 4.2,-4.2 4.2,-2 2,-2
  Top Layer region: 2,2 2,4.2 3.1,4.2 4.2,3.1 4.2,2
  silkscreen extent -4.85,-4 3.9,4.95, body extent -3.76,-3.75 3.75,3.75, height 2.5
CAPC0603X03L_C#1 [mm] "Chip Capacitor, 2-Leads, Body 0.6x0.3mm, IPC High Density"
  rect 0.27x0.3 smd mask+0.05: 1(-0.285,0) 2(0.285,0)
  silkscreen extent -0.49,-0.22 0.49,0.22, body extent -0.3,-0.15 0.31,0.15, height 0.3
CAPC0603X03L_C#2 [mm] "Chip Capacitor, 2-Leads, Body 0.6x0.3mm, IPC High Density"
  rect 0.27x0.3 smd: 1(-0.285,0) 2(0.285,0)
  silkscreen extent -0.49,-0.22 0.49,0.22, body extent -0.3,-0.15 0.31,0.15, height 0.3
CAPC0603X03L_C_NC [mm] "Chip Capacitor, 2-Leads, Body 0.6x0.3mm, IPC High Density"
  rect 0.27x0.3 smd mask+0.05: 1(-0.285,0) 2(0.285,0)
  silkscreen extent -0.49,-0.22 0.49,0.22
CAPC1005X04L [mm] "Chip Capacitor, 2-Leads, Body 1.0x0.5mm, IPC High Density"
  rect 0.6x0.5 smd: 1(-0.5,0) 2(0.5,0)
  silkscreen extent -0.9,-0.35 0.9,0.35, body extent -0.51,-0.25 0.51,0.25, height 0.5
CAPC1608X06L [mm] "Chip Capacitor, 2-Leads, Body 1.6x0.8mm, IPC High Density"
  rect 0.75x0.8 smd: 1(-0.675,0) 2(0.675,0)
  silkscreen extent -1.17,-0.5 1.17,0.5, body extent -0.8,-0.43 0.8,0.43, height 0.8
CAPC2012X11L [mm] "Chip Capacitor, 2-Leads, Body 2.0x1.3mm, IPC High Density"
  rect 1.1x1.4 smd: 1(-0.75,0) 2(0.75,0)
  silkscreen extent -1.43,-0.8 1.42,0.8, body extent -1,-0.62 1,0.63, height 0.77
CM1402 [mm]
  round 0.25 smd mask+0.05: A1(-0.75,0.435) A2(-0.25,0.435) A3(0.25,0.435) A4(0.75,0.435) B1(-0.5,0) B2(0.5,0) C1(-0.75,-0.435) C2(-0.25,-0.435) C3(0.25,-0.435) C4(0.75,-0.435)
  silkscreen extent -1.28,-0.73 1.04,0.96, body extent -0.98,-0.66 0.98,0.66, height 0.72
"COAXIAL RF U.FL-R-SMT-1" [mm]
  rect 1x1.05 smd: 1(0,-1.525)
  rect 1.05x2.2 smd: 2(-1.475,0) 2(1.475,0)
  Top Layer pour cut-out: 0.85,1.3 -0.85,1.3 -0.85,-1.525 0.85,-1.525
  silkscreen extent -1.32,-1.3 1.28,1.3, body extent -1.5,-1.6 1.5,1.5, height 1.25
COAXIAL-SWF [mm]
  rect 0.5x0.58 smd: 1(0,1.16) 3(0,-1.16)
  rect 0.75x0.8 smd: 2(-1.025,-0.95) 2(-1.025,0.95) 2(1.025,-0.95) 2(1.025,0.95)
  Top Layer pour cut-out: -0.65,0.55 0.65,0.55 0.65,1.35 -0.65,1.35
  Top Layer pour cut-out: 0.65,-0.55 -0.65,-0.55 -0.65,-1.35 0.65,-1.35
  silkscreen extent -1.25,-1.25 1.25,1.25, body extent -1.26,-1.3 1.26,1.3, height 1.55
DFN65P100X40-3L [mm] "DFN, 3-Leads, Body 0.60x1.00mm, Pitch 0.65mm, IPC High Density"
  rect 0.4x0.25 smd: 1(-0.35,0.225) 2(-0.35,-0.225)
  rect 0.4x0.7 smd: 3(0.35,0)
  silkscreen extent -0.57,0.58 -0.48,0.67, body extent -0.52,-0.32 0.53,0.32, height 0.4
DFN65P200X200X80_HS-6N [mm] "DFN, 6-Leads, Body 2.00x2.00mm, Pitch 0.65mm, IPC Medium Density"
  rect 0.55x0.42 smd mask+0.055: 1(-0.945,0.65) 2(-0.945,0) 3(-0.945,-0.65) 4(0.945,-0.65) 5(0.945,0) 6(0.945,0.65)
  rect 0.92x0.71 smd mask+0.055: 3(0,-0.475) 6(0,0.475)
  silkscreen extent -1.47,-1.08 1.08,1.27, body extent -1.02,-1.02 1.02,1.02, height 0.8
DFN1410-6N [mm] "PSON, 6-Leads, Body 1,40x1,00mm, Pitch 0,50mm, IPC Medium Density"
  rect 0.525x0.25 smd mask+0.05: 1(-0.363,0.5) 2(-0.363,0) 3(-0.363,-0.5) 4(0.363,-0.5) 5(0.363,0) 6(0.363,0.5)
  silkscreen extent -0.76,-0.8 0.48,0.96, body extent -0.53,-0.73 0.53,0.72, height 0.4
Fiducial_Round-Square [mm] "Fiducial Mark"
  round 1 smd far side paste-10 mask+0.5: 0(0,0)
  rect 1x1 smd paste-10 mask+0.5: 0(0,0)
  Top Layer keep-out lines w0.01: -1,-1 1,-1 1,1 -1,1 -1,-1
  Bottom Layer keep-out circle w0.01: c0,0 r1
FPC_05P-0.5mm-RA-SMD [mm] "FPC, 5-Leads, Pitch 0,5mm"
  rect 0.6x2.6 smd: 0(-0.9,-2.3) 0(2.9,-2.3)
  rect 0.3x0.8 smd mask+0.05: 1(0,0) 2(0.5,0) 3(1,0) 4(1.5,0) 5(2,0)
  silkscreen extent -1.38,-3.93 3.38,0.08, body extent -1.3,-3.85 3.3,0.2, height 1.2
FR01-S4-210_DF [mm]
  rect 2x3 smd: 0(0,0) 2(10.5,0) 4(-10.5,0)
  rect 3x3 smd: 1(13.5,0) 3(-13.5,0)
  Top Layer region: 15,-2.243 15,-0.312 14,-0.312 14,-2.243
  Top Layer region: 15,-9.2 15,-10.2 13,-10.2 13,-9.2
  Top Layer pour cut-out: -25,2 15.4,2 15.4,-10.5 -25,-10.5
  Top Layer region: -10.5,-0.5 -11.5,-0.5 -11.5,-4 -10.5,-4
  Top Layer region: -12,-0.5 -13,-0.5 -13,-4 -12,-4
  Top Layer region: 11.5,-0.5 10.5,-0.5 10.5,-4 11.5,-4
  Top Layer region: 13,-0.5 12,-0.5 12,-4 13,-4
  Top Layer region: 14,-2.547 15,-2.547 15,-10.022 14,-10.022
  Mid Layer 1 pour cut-out: -25,2 15.4,2 15.4,-10.5 -25,-10.5
  Mid Layer 2 pour cut-out: -25,2 15.4,2 15.4,-10.5 -25,-10.5
  Bottom Layer pour cut-out: -25,2 15.4,2 15.4,-10.5 -25,-10.5
  silkscreen extent -15,-1.6 15,1.6, body extent -15,-1.5 15,1.5, height 1
HDR_2x3_TH_2.00MM-NC [mm]
  rect 1.4x1.4 hole 0.9: 1(-2,-1)
  round 1.4 hole 0.9: 2(-2,1) 3(0,-1) 4(0,1) 5(2,-1) 6(2,1)
  silkscreen extent -3,-2 3,2
HDR_2x5-SMD-1.27mm-ANG [mm] "Pin Header Angled, 1.27mm SMD, FTSH-105 series, \"SWD\" version"
  round 1.02 hole 1.02 unplated: 0(-1.905,-4.32) 0(1.905,-4.32)
  rect 0.76x2.03 smd: 1(-2.54,-1.525) 2(-2.54,1.525) 3(-1.27,-1.525) 4(-1.27,1.525) 5(0,-1.525) 6(0,1.525) 7(1.27,-1.525) 8(1.27,1.525) 9(2.54,-1.525) 10(2.54,1.525)
  silkscreen extent -3.17,-5.57 3.17,-3.07, body extent -3.18,-8.63 3.17,2.27, height 3.41
HDR_2x5_TH_2.00MM-NC [mm]
  rect 1.4x1.4 hole 0.9: 1(-4,-1)
  round 1.4 hole 0.9: 2(-4,1) 3(-2,-1) 4(-2,1) 5(0,-1) 6(0,1) 7(2,-1) 8(2,1) 9(4,-1) 10(4,1)
  silkscreen extent -5,-2 5,2
HOLE_NP_3MM [mm] "Regular 3mm non-plated hole"
  round 3 hole 3 unplated paste+0 mask+0: ""(0,0)
  silkscreen extent -1.7,-1.7 1.7,1.7
INDC0603X03L_C [mm] "Chip Inductor, 2-Leads, Body 0.6x0.3mm, IPC High Density"
  rect 0.27x0.3 smd: 1(-0.285,0) 2(0.285,0)
  silkscreen extent -0.49,-0.22 0.49,0.22, body extent -0.31,-0.16 0.31,0.16, height 0.26
INDC0603X03L_C_NC [mm] "Chip Inductor, 2-Leads, Body 0.6x0.3mm, IPC High Density"
  rect 0.27x0.3 smd: 1(-0.285,0) 2(0.285,0)
  silkscreen extent -0.49,-0.22 0.49,0.22
INDC1005X04L [mm] "Chip Inductor, 2-Leads, Body 1.0x0.5mm, IPC High Density"
  rect 0.65x0.5 smd: 1(-0.475,0) 2(0.475,0)
  silkscreen extent -0.9,-0.35 0.9,0.35, body extent -0.5,-0.3 0.5,0.3, height 0.5
INDC1005X04L_WW [mm] "Chip Inductor, 2-Leads, Body 1.0x0.5mm, IPC High Density"
  rect 0.65x0.5 smd: 1(-0.475,0) 2(0.475,0)
  silkscreen extent -0.9,-0.35 0.9,0.35, body extent -0.5,-0.3 0.5,0.3, height 0.51
INDC1608X06L [mm] "Chip Inductor, 2-Leads, Body 1.6x0.8mm, IPC High Density"
  rect 0.75x0.8 smd: 1(-0.675,0) 2(0.675,0)
  silkscreen extent -1.17,-0.5 1.17,0.5, body extent -0.8,-0.48 0.8,0.48, height 0.8
INDC1608X06L_WW [mm] "Chip Inductor, 2-Leads, Body 1.6x0.8mm, IPC High Density"
  rect 0.75x0.8 smd: 1(-0.675,0) 2(0.675,0)
  silkscreen extent -1.17,-0.5 1.17,0.5, body extent -0.8,-0.45 0.8,0.45, height 0.81
INDC2016X18N [mm] "Chip Inductor, 2-Leads, Body 2,00x1,60mm, IPC Medium Density"
  rect 1x1.8 smd: 1(-0.8,0) 2(1,0)
  silkscreen extent -0.15,-0.77 0.35,0.77, body extent -0.9,-0.8 1.1,0.8, height 1
LED_RGB_0606 [mm]
  rect 0.65x0.85 smd paste+0: 1(-0.425,0.725) 2(0.425,0.725) 3(0.425,-0.725) 4(-0.425,-0.725)
  silkscreen extent -0.75,-0.8 0.75,0.8, body extent -0.75,-0.8 0.75,0.8, height 0.35
LGA50P322X300X114-16N [mm] "LGA, 16-Leads, Body 3.25x3.00mm, Pitch 0.50mm, IPC Medium Density"
  rect 0.925x0.3 smd mask+0.06: 1(-1.288,1) 2(-1.288,0.5) 3(-1.288,0) 4(-1.288,-0.5) 5(-1.288,-1) 9(1.288,-1) 10(1.288,-0.5) 11(1.288,0) 12(1.288,0.5) 13(1.288,1)
  rect 0.3x0.8 smd mask+0.06: 6(-0.5,-1.275) 7(0,-1.275) 8(0.5,-1.275) 14(0.5,1.275) 15(0,1.275) 16(-0.5,1.275)
  silkscreen extent -2.5,-1.62 1.72,1.67, body extent -1.65,-1.55 1.65,1.55, height 1.14
LGA50P1600X1050X104-161N [mm]
  rect 0.54x0.54 smd mask+0.05: 1(-7.87,5.12) 21(-7.87,-5.12) 52(7.87,-5.12) 72(7.87,5.12)
  rect 0.54x0.3 smd mask+0.05: 2(-7.87,4.5) 3(-7.87,4) 4(-7.87,3.5) 5(-7.87,3) 6(-7.87,2.5) 7(-7.87,2) 8(-7.87,1.5) 9(-7.87,1) 10(-7.87,0.5) 11(-7.87,0) 12(-7.87,-0.5) 13(-7.87,-1) 14(-7.87,-1.5) 15(-7.87,-2) 16(-7.87,-2.5) 17(-7.87,-3) 18(-7.87,-3.5) 19(-7.87,-4) 20(-7.87,-4.5) 53(7.87,-4.5) 54(7.87,-4) 55(7.87,-3.5) 56(7.87,-3) 57(7.87,-2.5) 58(7.87,-2) 59(7.87,-1.5) 60(7.87,-1) 61(7.87,-0.5) 62(7.87,0) 63(7.87,0.5) 64(7.87,1) 65(7.87,1.5) 66(7.87,2) 67(7.87,2.5) 68(7.87,3) 69(7.87,3.5) 70(7.87,4) 71(7.87,4.5)
  rect 0.3x0.54 smd mask+0.05: 22(-7.25,-5.12) 23(-6.75,-5.12) 24(-6.25,-5.12) 25(-5.75,-5.12) 26(-5.25,-5.12) 27(-4.75,-5.12) 28(-4.25,-5.12) 29(-3.75,-5.12) 30(-3.25,-5.12) 31(-2.75,-5.12) 32(-2.25,-5.12) 33(-1.75,-5.12) 34(-1.25,-5.12) 35(-0.75,-5.12) 36(-0.25,-5.12) 37(0.25,-5.12) 38(0.75,-5.12) 39(1.25,-5.12) 40(1.75,-5.12) 41(2.25,-5.12) 42(2.75,-5.12) 43(3.25,-5.12) 44(3.75,-5.12) 45(4.25,-5.12) 46(4.75,-5.12) 47(5.25,-5.12) 48(5.75,-5.12) 49(6.25,-5.12) 50(6.75,-5.12) 51(7.25,-5.12) 73(7.25,5.12) 74(6.75,5.12) 75(6.25,5.12) 76(5.75,5.12) 77(5.25,5.12) 78(4.75,5.12) 79(4.25,5.12) 80(3.75,5.12) 81(3.25,5.12) 82(2.75,5.12) 83(2.25,5.12) 84(1.75,5.12) 85(1.25,5.12) 86(0.75,5.12) 87(0.25,5.12) 88(-0.25,5.12) 89(-0.75,5.12) 90(-1.25,5.12) 91(-1.75,5.12) 92(-2.25,5.12) 93(-2.75,5.12) 94(-3.25,5.12) 95(-3.75,5.12) 96(-4.25,5.12) 97(-4.75,5.12) 98(-5.25,5.12) 99(-5.75,5.12) 100(-6.25,5.12) 101(-6.75,5.12) 102(-7.25,5.12)
  rect 0.8x0.8 smd mask+0.05: 103(-6,-3.2) 103(-6,-1.6) 103(-6,0) 103(-6,1.6) 103(-6,3.2) 103(-4,-3.2) 103(-4,-1.6) 103(-4,0) 103(-4,1.6) 103(-4,3.2) 103(-2,-3.2) 103(-2,-1.6) 103(-2,0) 103(-2,1.6) 103(-2,3.2) 103(0,-3.2) 103(0,-1.6) 103(0,0) 103(0,1.6) 103(0,3.2) 103(2,-3.2) 103(2,-1.6) 103(2,0) 103(2,1.6) 103(2,3.2) 103(4,-3.2) 103(4,-1.6) 103(4,0) 103(4,1.6) 103(4,3.2) 103(6,-3.2) 103(6,-1.6) 103(6,0) 103(6,1.6) 103(6,3.2)
  rect 0.3x0.3 smd mask+0.05: 104(-5.75,-4.35) 105(-5.25,-4.35) 106(-4.75,-4.35) 107(-4.25,-4.35) 108(-1.75,-4.35) 109(-1.25,-4.35) 110(-0.75,-4.35) 111(-0.25,-4.35) 112(3.25,-4.35) 113(3.75,-4.35) 114(4.25,-4.35) 115(4.75,-4.35) 116(4.75,4.35) 117(4.25,4.35) 118(3.75,4.35) 119(3.25,4.35) 120(-0.25,4.35) 121(-0.75,4.35) 122(-1.25,4.35) 123(-1.75,4.35) 124(-4.25,4.35) 125(-4.75,4.35) 126(-5.25,4.35) 127(-5.75,4.35)
  Top Layer pour cut-out: -8.15,5.4 8.15,5.4 8.15,-5.4 -8.15,-5.4
  silkscreen extent -8.81,-5.5 8.25,5.5, body extent -8.05,-5.3 8.05,5.3, height 1.2
LIST_1x2-NC [mm] "Pin List, 2.54mm through hole"
  rect 1.5x1.5 hole 0.9: 1(-1.27,0)
  round 1.5 hole 0.9: 2(1.27,0)
  silkscreen extent -2.54,-1.27 2.54,1.27
MSL0104 [mm]
  rect 1.06x1.58 smd paste+0: 1(-2.95,0.3) 1(2.95,0.3)
  rect 0.6x2.18 smd paste+0: 2(1.8,0) 3(0.9,0) 4(0,0) 5(-0.9,0) 6(-1.8,0)
  silkscreen extent -3.2,1.3 3.2,1.75, body extent -3.45,-0.4 3.45,1.78, height 2.15
PSON50P100X60-6N [mm] "PSON, 6-Leads, Body 1.45x1.00mm, Pitch 0.50mm, IPC Medium Density"
  rect 0.52x0.3 smd mask+0.05: 1(-0.38,0.5)
  rect 0.49x0.3 smd mask+0.05: 2(-0.375,0) 3(-0.375,-0.5) 4(0.375,-0.5) 5(0.375,0) 6(0.375,0.5)
  silkscreen extent -0.74,-0.79 0.53,0.91, body extent -0.53,-0.75 0.53,0.75, height 0.6
RESC0603X03L_C [mm] "Chip Resistor, 2-Leads, Body 0.6x0.3mm, IPC High Density"
  rect 0.27x0.3 smd: 1(-0.285,0) 2(0.285,0)
  silkscreen extent -0.49,-0.22 0.49,0.22, body extent -0.3,-0.15 0.3,0.15, height 0.23
RESC0603X03L_C_NC [mm] "Chip Resistor, 2-Leads, Body 0.6x0.3mm, IPC High Density"
  rect 0.27x0.3 smd: 1(-0.285,0) 2(0.285,0)
  silkscreen extent -0.49,-0.22 0.49,0.22
RESC1005X04L [mm] "Chip Resistor, 2-Leads, Body 1.0x0.5mm, IPC High Density"
  rect 0.6x0.55 smd: 1(-0.5,0) 2(0.5,0)
  silkscreen extent -0.87,-0.38 0.87,0.38, body extent -0.5,-0.25 0.5,0.25, height 0.3
SAFFB2G45MA0F0A [mm] "SOT23, 5-Leads, Body 2,90x2,80mm, Pitch 0,95mm, IPC Medium Density"
  rect 0.2x0.25 smd: 1(-0.4,0) 2(0,-0.25) 3(0.4,-0.25) 4(0.4,0.25) 5(0,0.25)
  silkscreen extent -0.81,-0.71 0.61,0.51, body extent -0.55,-0.45 0.55,0.45, height 0.5
SF72S006VBAR2500 [mm] "SOT23, 5-Leads, Body 2,90x2,80mm, Pitch 0,95mm, IPC Medium Density"
  rect 0.45x1.9 smd: 0(-11.175,6.75) 0(0,6.75)
  rect 0.45x2.9 smd: 0(-11.175,1.9) 0(0,1.9)
  rect 0.75x0.7 smd: 0(-10.675,10.9)
  rect 1.4x0.5 smd: 0(-8.78,13.85) 0(-4.38,13.85)
  rect 0.3x0.6 smd: 0(-7.8,0.75) 0(-5.36,0.75)
  rect 0.45x2.4 smd: 0(0,11.9)
  rect 0.9x0.7 smd: C1(-4.14,2.6) C2(-6.58,2.6) C3(-9.02,2.6) C5(-4.04,5.77) C6(-6.58,5.77) C7(-9.12,5.77)
  rect 0.6x0.6 smd: CSW(-10.95,9.1)
  rect 1.2x0.65 smd: DSW(-7.13,12.775)
  Top Layer pour cut-out: -10.084,9.5 -3.073,9.5 -3.073,-0.025 -10.084,-0.025
  Top Layer pour cut-out: -8.407,13.106 -3.48,13.106 -3.48,9.855 -8.407,9.855
  silkscreen extent -11.3,-0.67 0.67,14.53, body extent -11.2,0.05 0.02,14.4, height 1.25
SM03B-SRSS-TB [mm] "JST, SH connector, side entry SMD, 1mm pitch"
  rect 1.2x1.8 smd: 0(-2.6,-3.875) 0(2.6,-3.875)
  rect 0.6x1.55 smd: 1(-1,0) 2(0,0) 3(1,0)
  silkscreen extent -2.57,-4.68 2.58,-0.3, body extent -2.5,-4.61 2.5,0.34, height 2.95
SOD-123-DIODE [mil]
  rect 36x48 smd: 1(-70,0) 2(70,0)
  silkscreen extent -58,-36 58,36, body extent -77,-33 75,33, height 56
SODFL100X40-2N [mm] "SODFL, 2-Leads, Body 0.60x1.00mm, IPC Medium Density"
  rect 0.36x0.25 smd: 1(-0.42,0) 2(0.42,0)
  silkscreen extent -0.7,-0.35 0.5,0.5, body extent -0.5,-0.33 0.5,0.32, height 0.4
Solderbridge#1 [mm]
  round 0.2 smd paste-10: 1(-0.312,0) 2(0.312,0)
  Top Layer region: 0.077,0.432 0.152,0.505 0.271,0.467 0.335,0.424 0.409,0.351 0.462,0.292 0.521,0.193 0.549,0.099 0.544,-0.122 0.518,-0.193 0.434,-0.33 0.351,-0.411 0.259,-0.469 0.157,-0.5 0.107,-0.483 0.077,-0.43
  Top Layer region: -0.077,-0.432 -0.152,-0.505 -0.271,-0.467 -0.335,-0.424 -0.409,-0.351 -0.462,-0.292 -0.521,-0.193 -0.549,-0.099 -0.544,0.122 -0.518,0.193 -0.434,0.33 -0.351,0.411 -0.259,0.469 -0.157,0.5 -0.107,0.483 -0.077,0.43
  Top Layer lines w0.152: -0.153,-0.431 cw(c-0.042,0) -0.456,0.162 cw(c-0.042,0) -0.153,0.431 ; 0.153,-0.431 ccw(c0.042,0) 0.457,-0.16 ccw(c0.042,0) 0.487,0 ccw(c0.042,0) 0.153,0.431
Solderbridge#2 [mm]
  round 0.2 smd paste-10: 1(-0.312,0) 2(0.312,0)
  Top Layer region: 0.077,0.432 0.152,0.505 0.271,0.467 0.335,0.424 0.409,0.351 0.462,0.292 0.521,0.193 0.549,0.099 0.544,-0.122 0.518,-0.193 0.434,-0.33 0.351,-0.411 0.259,-0.469 0.157,-0.5 0.107,-0.483 0.077,-0.43
  Top Layer region: -0.077,-0.432 -0.152,-0.505 -0.271,-0.467 -0.335,-0.424 -0.409,-0.351 -0.462,-0.292 -0.521,-0.193 -0.549,-0.099 -0.544,0.122 -0.518,0.193 -0.434,0.33 -0.351,0.411 -0.259,0.469 -0.157,0.5 -0.107,0.483 -0.077,0.43
  Top Layer lines w0.152: -0.153,-0.431 cw(c-0.042,0) -0.254,-0.391 cw(c-0.042,0) -0.258,-0.389 cw(c-0.042,0) -0.258,0.389 cw(c-0.042,0) -0.254,0.391 cw(c-0.042,0) -0.153,0.431 ; 0.153,-0.431 ccw(c0.042,0) 0.312,0.353 ccw(c0.042,0) 0.153,0.431
Solderbridge#3 [mm]
  round 0.2 smd paste-10: 1(-0.312,0) 2(0.312,0)
  Top Layer region: 0.077,0.432 0.152,0.505 0.271,0.467 0.335,0.424 0.409,0.351 0.462,0.292 0.521,0.193 0.549,0.099 0.544,-0.122 0.518,-0.193 0.434,-0.33 0.351,-0.411 0.259,-0.469 0.157,-0.5 0.107,-0.483 0.077,-0.43
  Top Layer region: -0.077,-0.432 -0.152,-0.505 -0.271,-0.467 -0.335,-0.424 -0.409,-0.351 -0.462,-0.292 -0.521,-0.193 -0.549,-0.099 -0.544,0.122 -0.518,0.193 -0.434,0.33 -0.351,0.411 -0.259,0.469 -0.157,0.5 -0.107,0.483 -0.077,0.43
  Top Layer lines w0.152: -0.153,-0.431 cw(c-0.042,0) -0.254,-0.391 cw(c-0.042,0) -0.258,-0.389 cw(c-0.042,0) -0.258,0.389 cw(c-0.042,0) -0.254,0.391 cw(c-0.042,0) -0.153,0.431 ; 0.153,-0.431 ccw(c0.042,0) 0.312,-0.353 ccw(c0.042,0) 0.381,-0.288 ccw(c0.042,0) 0.461,-0.149 ccw(c0.042,0) 0.153,0.431
Solderbridge_Shorted#1 [mm]
  round 0.2 smd paste-10: 1(-0.338,0) 2(0.338,0)
  Top Layer region: -0.102,-0.432 -0.178,-0.505 -0.296,-0.467 -0.361,-0.424 -0.434,-0.351 -0.488,-0.292 -0.546,-0.193 -0.574,-0.099 -0.569,0.122 -0.544,0.193 -0.46,0.33 -0.376,0.411 -0.284,0.469 -0.183,0.5 -0.132,0.483 -0.102,0.43
  Top Layer region: 0.102,0.432 0.178,0.505 0.296,0.467 0.361,0.424 0.434,0.351 0.488,0.292 0.546,0.193 0.574,0.099 0.569,-0.122 0.544,-0.193 0.46,-0.33 0.376,-0.411 0.284,-0.469 0.183,-0.5 0.132,-0.483 0.102,-0.43
  Top Layer lines w0.152: -0.178,-0.431 cw(c-0.068,0) -0.178,0.431 ; 0.178,-0.431 ccw(c0.068,0) 0.178,0.431
  Top Layer lines w0.203: -0.338,0 0.338,0
Solderbridge_Shorted#2 [mm]
  round 0.2 smd paste-10: 1(-0.338,0) 2(0.338,0)
  Top Layer region: 0.102,0.432 0.178,0.505 0.296,0.467 0.361,0.424 0.434,0.351 0.488,0.292 0.546,0.193 0.574,0.099 0.569,-0.122 0.544,-0.193 0.46,-0.33 0.376,-0.411 0.284,-0.469 0.183,-0.5 0.132,-0.483 0.102,-0.43
  Top Layer region: -0.102,-0.432 -0.178,-0.505 -0.296,-0.467 -0.361,-0.424 -0.434,-0.351 -0.488,-0.292 -0.546,-0.193 -0.574,-0.099 -0.569,0.122 -0.544,0.193 -0.46,0.33 -0.376,0.411 -0.284,0.469 -0.183,0.5 -0.132,0.483 -0.102,0.43
  Top Layer lines w0.152: -0.178,0.431 ccw(c-0.068,0) -0.487,0.149 ccw(c-0.068,0) -0.178,-0.431 ; 0.178,0.431 cw(c0.068,0) 0.178,-0.431
  Top Layer lines w0.203: -0.338,0 0.338,0
SON127P600X90_HS-8N [mm] "SON, 8-Leads, Body 5.00x6.00mm, Pitch 1.27mm, IPC Medium Density"
  rect 1.5x0.35 smd: 0(-0.95,-1.73) 0(-0.95,1.73) 0(0.95,-1.73) 0(0.95,1.73)
  rect 1.5x0.7 smd: 0(-0.95,-0.635) 0(-0.95,0.635) 0(0.95,-0.635) 0(0.95,0.635)
  rect 1.1x0.5 smd: 1(-2.75,1.905) 2(-2.75,0.635) 3(-2.75,-0.635) 4(-2.75,-1.905) 5(2.75,-1.905) 6(2.75,-0.635) 7(2.75,0.635) 8(2.75,1.905)
  silkscreen extent -3.6,-2.58 3.08,2.72, body extent -3,-2.5 3,2.5, height 0.65
SOT-23-5 [mm] "SOT-23/SC-74A; 5 Leads; Body 3.1 x 3 mm, inc. leads (LxW max)"
  rect 0.55x1.45 smd: 1(-0.95,-1.075) 2(0,-1.075) 3(0.95,-1.075) 4(0.95,1.075) 5(-0.95,1.075)
  silkscreen extent -1.57,-1.35 1.55,0.9, body extent -1.5,-1.5 1.5,1.5, height 1.3
SOT-23a [mil] "SOT-23 footprint"
  rect 30x40 smd: 1(0,0) 2(74.8,0) 3(37.4,82.68)
  silkscreen extent -39,-4 94,79, body extent -20,-5 95,87, height 39
SW_TACTILE_2.6x3.0MM_4-LEAD [mm] "2.6×3.0mm TACT Switch, without ground connector"
  rect 0.65x0.7 smd: 1(-1.475,0.95) 1(1.475,0.95) 2(-1.475,-0.95) 2(1.475,-0.95)
  Top Layer keep-out region: -0.9,-1.3 0.9,-1.3 0.9,1.3 -0.9,1.3
  silkscreen extent -1.5,-1.3 1.5,1.3, body extent -1.6,-1.3 1.6,1.3, height 0.65
Switch-PB-6.2x6.3mm-SMD [mm] "6.2×6.5mm TACT Switch, without ground connector"
  rect 2.75x1.39 smd: 1(-3.375,2)
  rect 2.75x1.4 smd: 1(3.375,2) 2(-3.375,-2) 2(3.375,-2)
  silkscreen extent -3,-3 3,3, body extent -4,-3 4,3.3, height 3.1
Switch-Slide-RA-J-Lead-DPDT-8.5x3.5mm [mm] "Slide Switches - DPDT, SMD, ON-ON"
  round 0.9 hole 0.9 unplated mask+0: 0(-3.4,0) 0(3.4,0)
  rect 1x1.6 smd: 1(-2.5,-1.4) 2(0,-1.4) 3(2.5,-1.4) 4(-2.5,1.4) 5(0,1.4) 6(2.5,1.4)
  silkscreen extent -4.5,-3.8 4.5,1.75, body extent -4.25,-3.75 4.25,1.75, height 3.5
TP_SMD_Ø0.7mm [mm]
  round 0.7 smd paste-5: 1(0,0)
  silkscreen extent -0.52,-0.52 0.52,0.52
TP_SMD_Ø1.0mm [mm]
  round 1 smd paste-5: 1(0,0)
  silkscreen extent -0.68,-0.68 0.68,0.68
TP_SMD_Ø1.5mm [mm]
  round 1.5 smd paste-5: 1(0,0)
  silkscreen extent -0.95,-0.95 0.95,0.95
UFQFN40P200X200X65_HS-15N#1 [mm] "UFQFN, 14-Leads, Body 2.00x2.00mm, Pitch 0.45mm/0.40mm, Thermal Pad 1.00x1.00mm, IPC Medium Density"
  rect 0.23x0.25 smd paste-1 mask+0.06: 1(-0.845,0.675) 2(-0.845,0.225) 3(-0.845,-0.225) 4(-0.845,-0.675) 8(0.845,-0.675) 9(0.845,-0.225) 10(0.845,0.225) 11(0.845,0.675)
  rect 0.25x0.23 smd paste-1 mask+0.06: 5(-0.4,-0.845) 6(0,-0.845) 7(0.4,-0.845) 12(0.4,0.845) 13(0,0.845) 14(-0.4,0.845)
  rect 1x1 smd paste-1 mask+0.06: 15(0,0)
  oval 0.23x0.25 on Top Paste: ""(-0.845,0.225) ""(-0.845,-0.675) ""(-0.845,-0.225) ""(-0.845,0.675) ""(0.845,-0.675) ""(0.845,-0.225) ""(0.845,0.225) ""(0.845,0.675)
  oval 0.25x0.23 on Top Paste: ""(-0.4,-0.845) ""(-0.4,0.845) ""(0,-0.845) ""(0,0.845) ""(0.4,-0.845) ""(0.4,0.845)
  rrect25% 0.85x0.85 on Top Paste: ""(0,0)
  silkscreen extent -1.37,-1.05 1.05,1.37, body extent -1.02,-1.02 1.03,1.03, height 0.65
UFQFN40P200X200X65_HS-15N#2 [mm] "UFQFN, 14-Leads, Body 2.00x2.00mm, Pitch 0.45mm/0.40mm, Thermal Pad 1.00x1.00mm, IPC Medium Density"
  rect 0.23x0.25 smd paste-1 mask+0.06: 1(-0.845,0.675) 2(-0.845,0.225) 3(-0.845,-0.225) 4(-0.845,-0.675) 8(0.845,-0.675) 9(0.845,-0.225) 10(0.845,0.225) 11(0.845,0.675)
  rect 0.25x0.23 smd paste-1 mask+0.06: 5(-0.4,-0.845) 6(0,-0.845) 7(0.4,-0.845) 12(0.4,0.845) 13(0,0.845) 14(-0.4,0.845)
  rect 1x1 smd paste-1 mask+0.06: 15(0,0)
  oval 0.23x0.25 on Bottom Paste: ""(-0.845,0.225) ""(-0.845,-0.675) ""(-0.845,-0.225) ""(-0.845,0.675) ""(0.845,-0.675) ""(0.845,-0.225) ""(0.845,0.225) ""(0.845,0.675)
  oval 0.25x0.23 on Bottom Paste: ""(-0.4,-0.845) ""(-0.4,0.845) ""(0,-0.845) ""(0,0.845) ""(0.4,-0.845) ""(0.4,0.845)
  rrect25% 0.85x0.85 on Bottom Paste: ""(0,0)
  silkscreen extent -1.37,-1.05 1.05,1.37, body extent -1.02,-1.02 1.03,1.03, height 0.65
USB-Micro-B-RA-SMD-PiP [mm] "Micro USB B SMT"
  rect 1.35x0.4 smd: 1(0,1.3) 2(0,0.65) 3(0,0) 4(0,-0.65) 5(0,-1.3)
  oval 1.6x0.9 hole 0.5 slot 1.2 at 0 deg: 6(-2.675,-3.3) 6(-2.675,3.3)
  oval 2x1.5 on Bottom Paste: 6(-2.675,-3.3) 6(-2.675,3.3)
  rect 1.55x1.9 smd: 6(-2.675,-1.2) 6(-2.675,1.2)
  rect 1.4x1.6 smd: 6(-0.225,-3.2) 6(-0.225,3.2)
  silkscreen extent -4.75,-3.75 0.25,3.75, body extent -5.28,-4.1 0.15,4.1, height 2.72
WSON50P210X210X60_HS-9N [mm] "WSON, 8-Leads, Body 2.10x2.10mm, Pitch 0.50mm, Thermal Pad 0.75x1.50mm, IPC Medium Density"
  rect 0.65x0.25 smd: 1(-1.075,0.75) 2(-1.075,0.25) 3(-1.075,-0.25) 4(-1.075,-0.75) 5(1.075,-0.75) 6(1.075,-0.25) 7(1.075,0.25) 8(1.075,0.75)
  rect 0.75x1.5 smd: 9(0,0)
  silkscreen extent -1.67,-1.15 1.1,1.67, body extent -1.1,-1.05 1.1,1.05, height 0.6
XFDFN40P100X55-6N [mm] "XFDFN, 6-Leads, Body 1.10x0.70mm, Pitch 0.40mm, IPC Medium Density"
  rect 0.25x0.25 smd mask+0.05: 1(-0.2,0.4) 2(-0.2,0) 3(-0.2,-0.4) 4(0.2,-0.4) 5(0.2,0) 6(0.2,0.4)
  silkscreen extent -0.61,-0.61 0.41,0.81, body extent -0.38,-0.58 0.38,0.58, height 0.4
XQFN40P180X260X50-16N [mm] "QFN, 16-Leads, Body 1.80x2.60mm, Pitch 0.40mm, IPC Medium Density"
  oval 0.65x0.22 smd paste-0.02 mask+0.04: 1(-0.825,0.6) 2(-0.825,0.2) 3(-0.825,-0.2) 4(-0.825,-0.6) 9(0.825,-0.6) 10(0.825,-0.2) 11(0.825,0.2) 12(0.825,0.6)
  oval 0.22x0.65 smd paste-0.02 mask+0.04: 5(-0.6,-1.225) 6(-0.2,-1.225) 7(0.2,-1.225) 8(0.6,-1.225) 13(0.6,1.225) 14(0.2,1.225) 15(-0.2,1.225) 16(-0.6,1.225)
  silkscreen extent -1.45,-1.4 1,1.4, body extent -0.91,-1.31 0.91,1.31, height 0.55
XTAL_1610 [mm] "XTAL SMD 1.6 x 1.0 mm"
  rect 0.5x1 smd: 1(-0.55,0) 2(0.55,0)
  silkscreen extent -0.15,-0.5 0.15,0.5, body extent -0.8,-0.5 0.8,0.5, height 0.5